# Altium PCB FMUM.PcbDoc (part 1 of 4)
Units mm, origin at the board's own origin, x right, y up, seen from the top; angles counter-clockwise.
Board outline 36 x 29 mm, 8 copper layers (Top Layer, GND1, Signal1, GND2, PWR1, Signal2, GND3, Bottom Layer), stack 1.01 mm thick; 117 components, 167 nets, 719 pads, 811 vias.
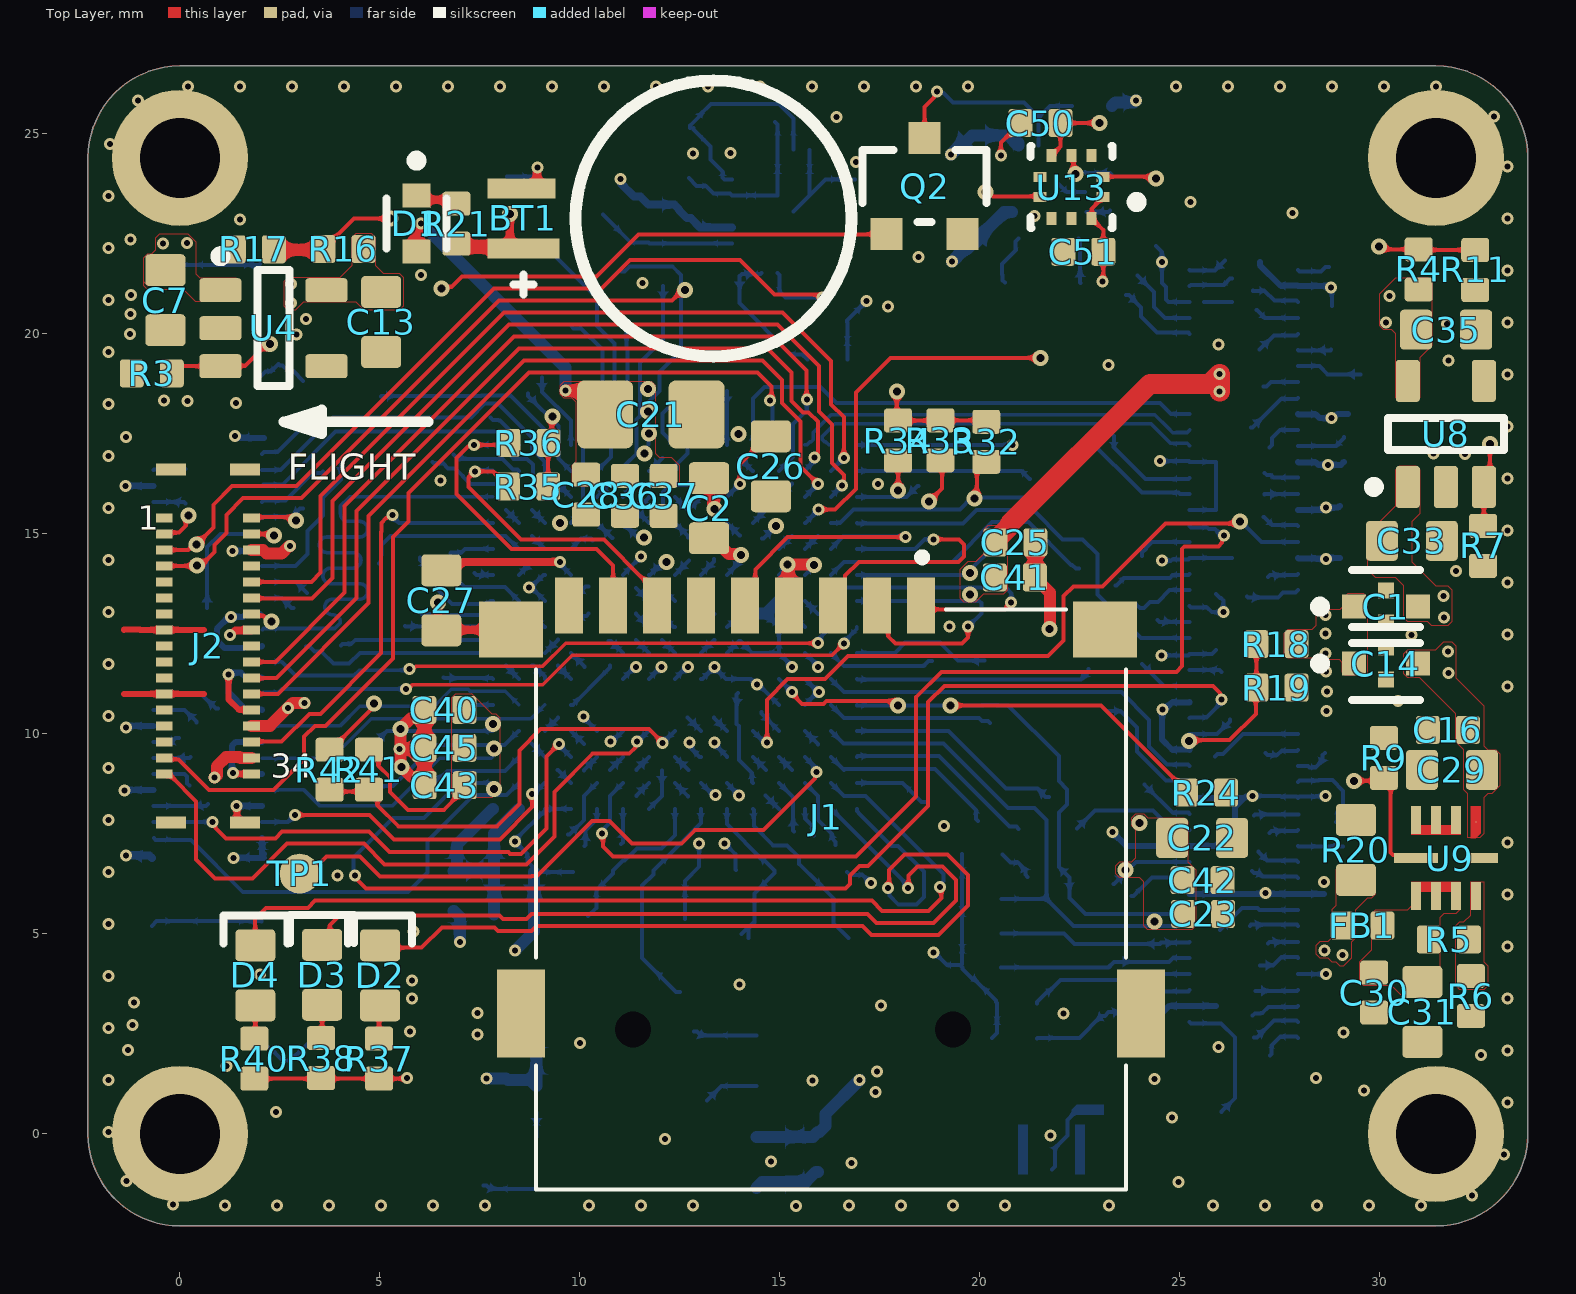
[diagram p0: Top Layer view]
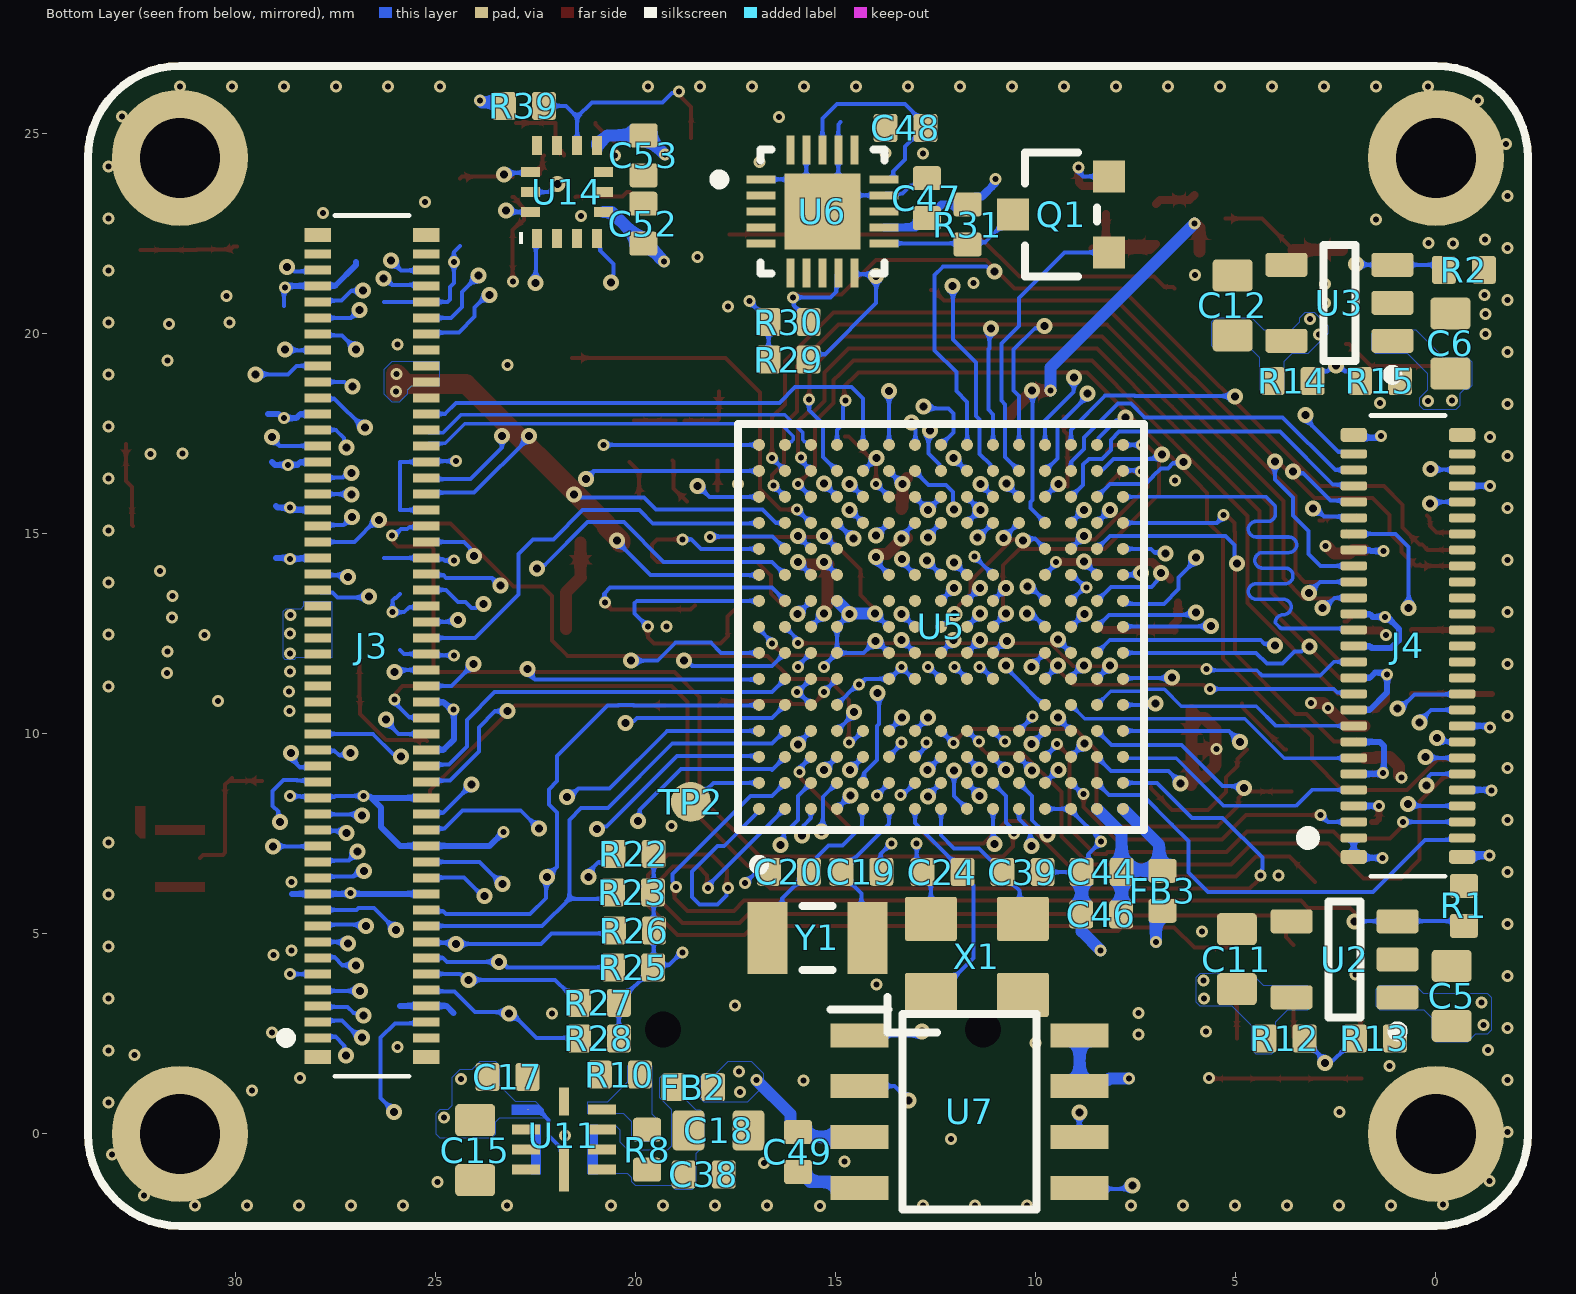
[diagram p1: Bottom Layer view, seen from below]
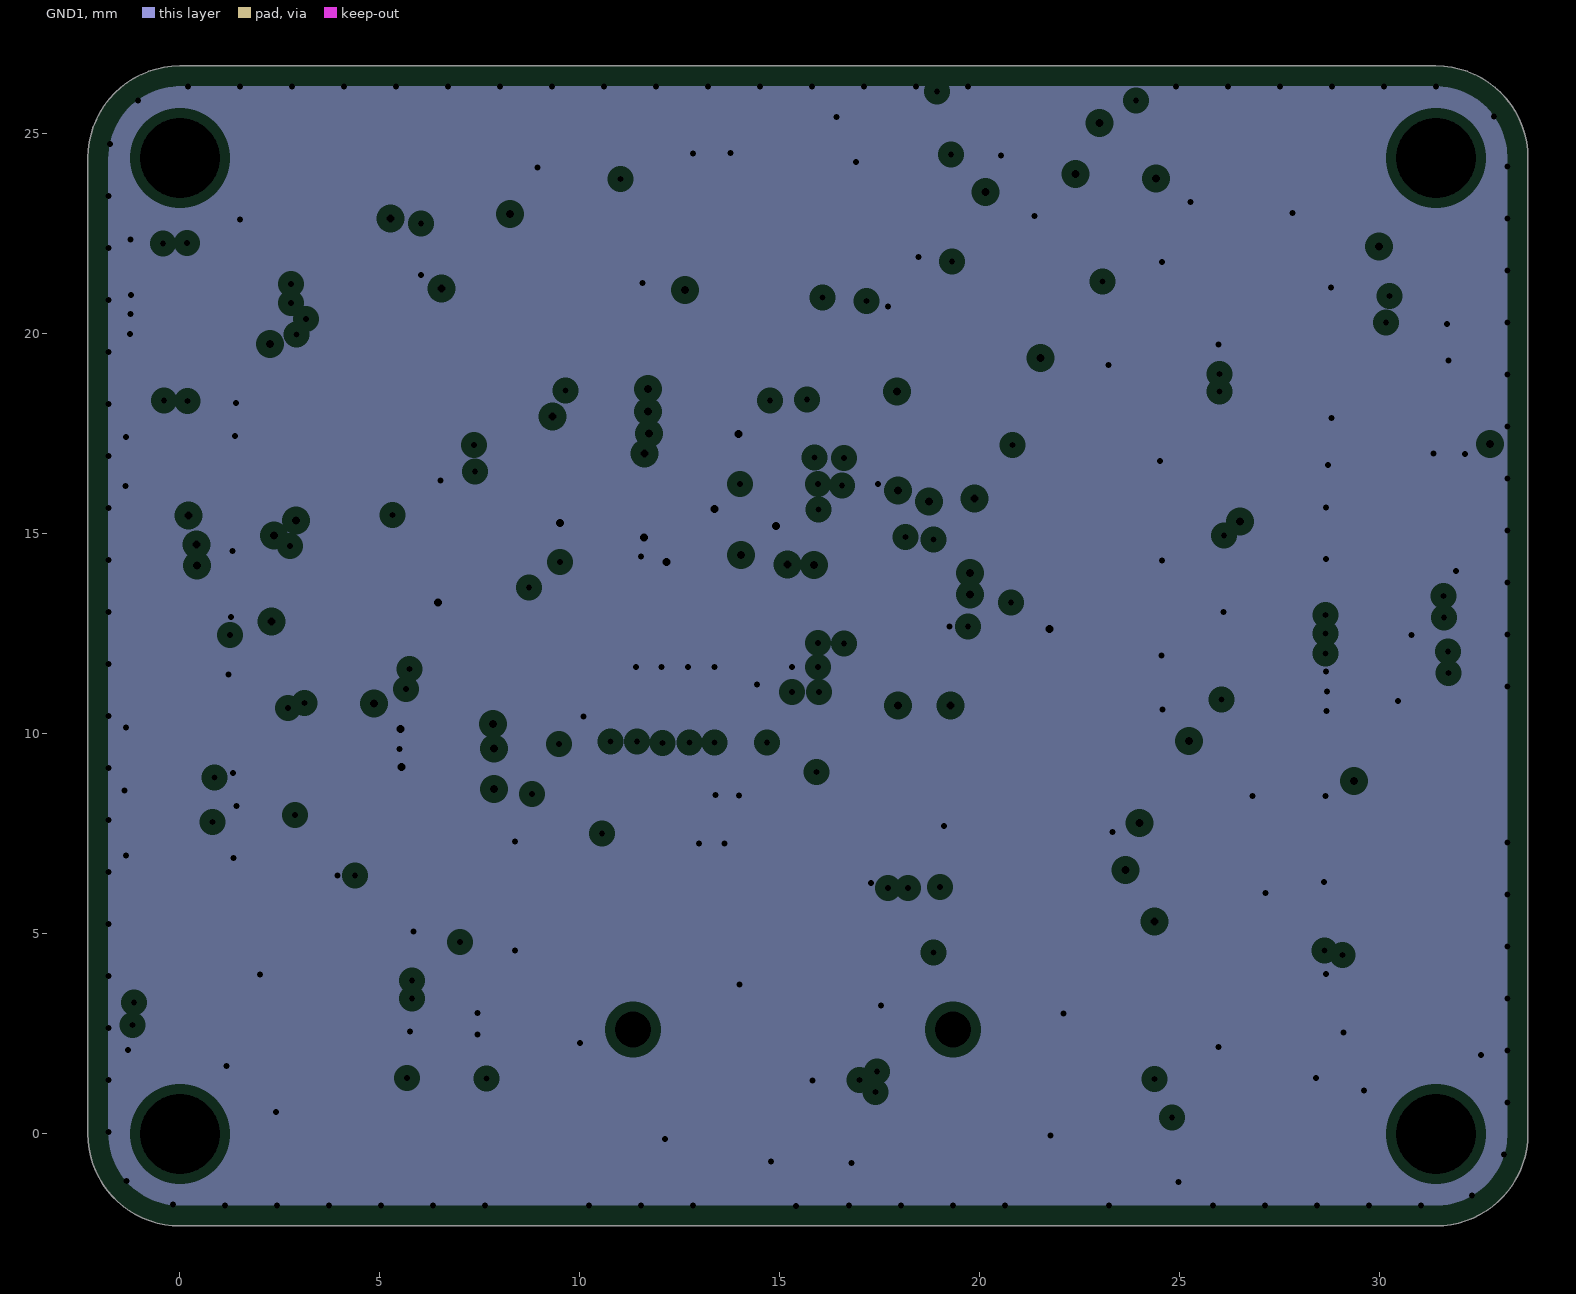
[diagram p2: GND1, clearances drawn from the general rule]
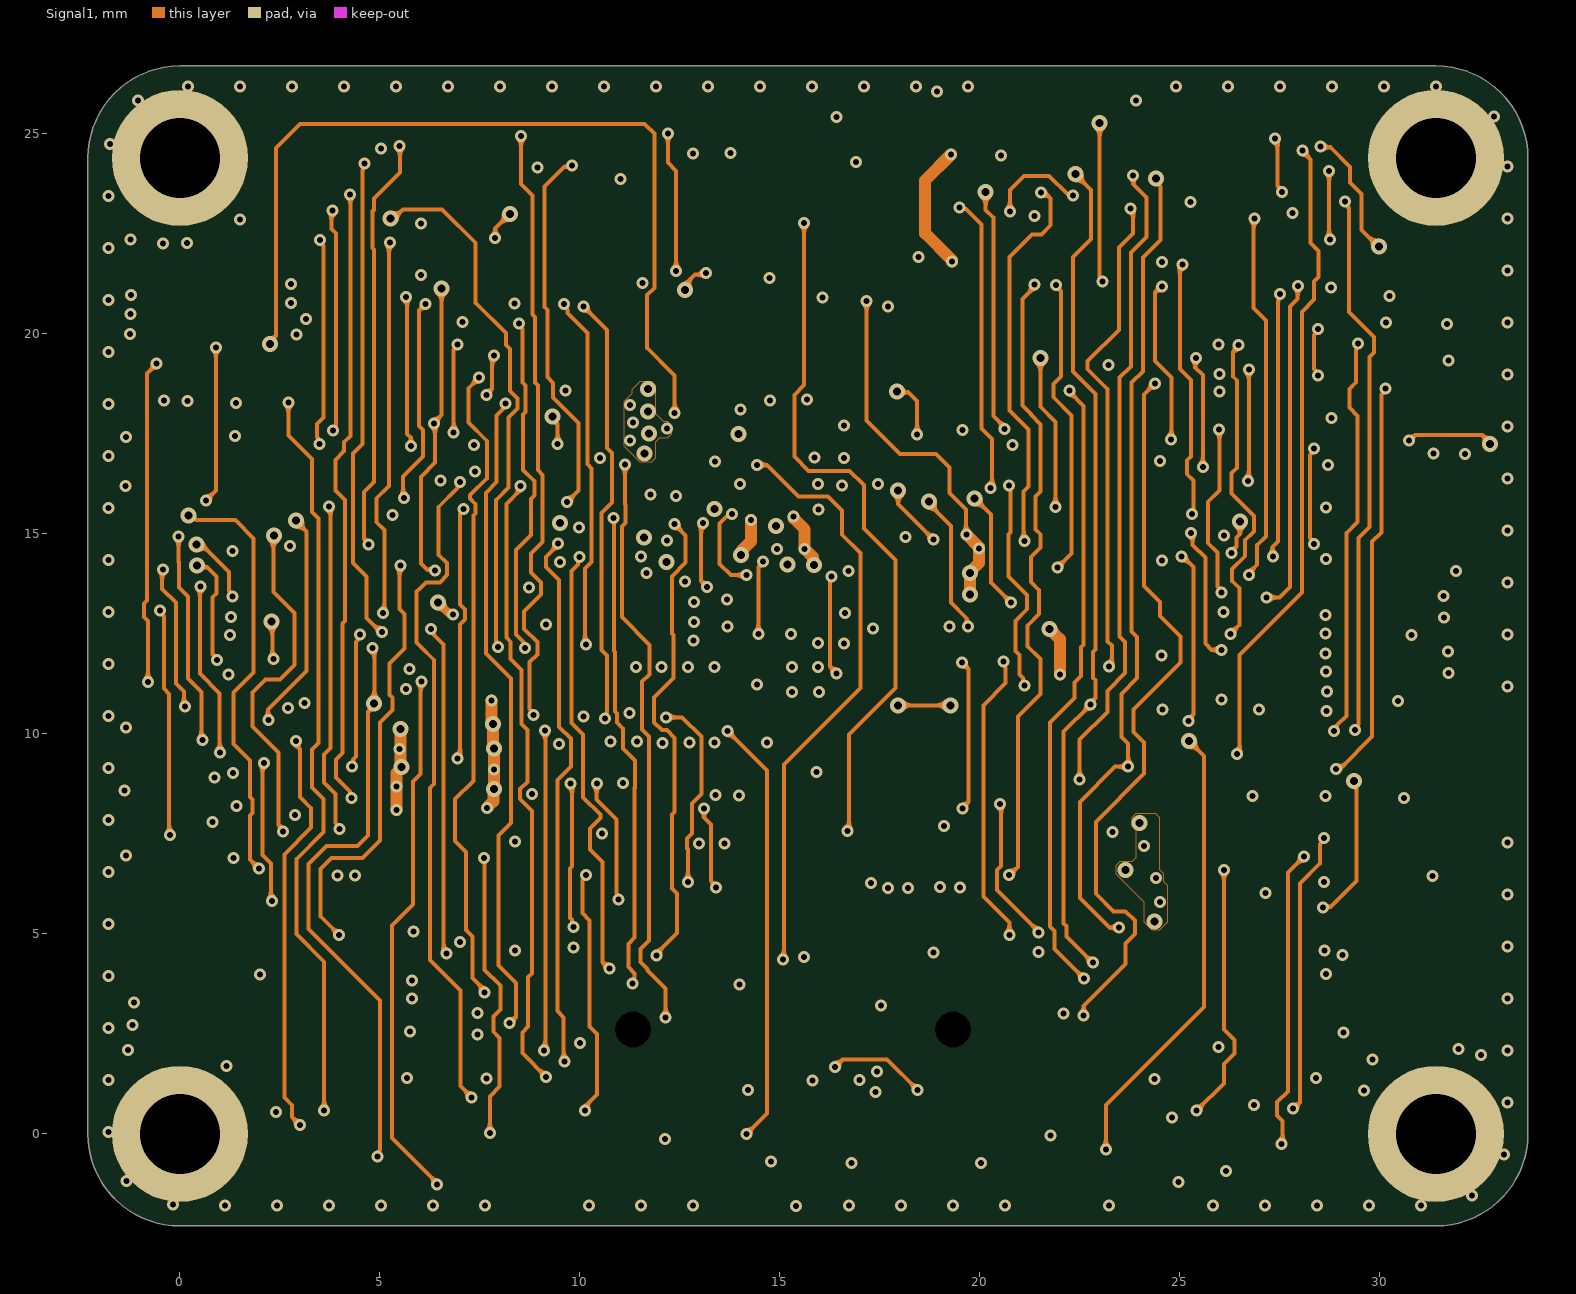
[diagram p3: Signal1]
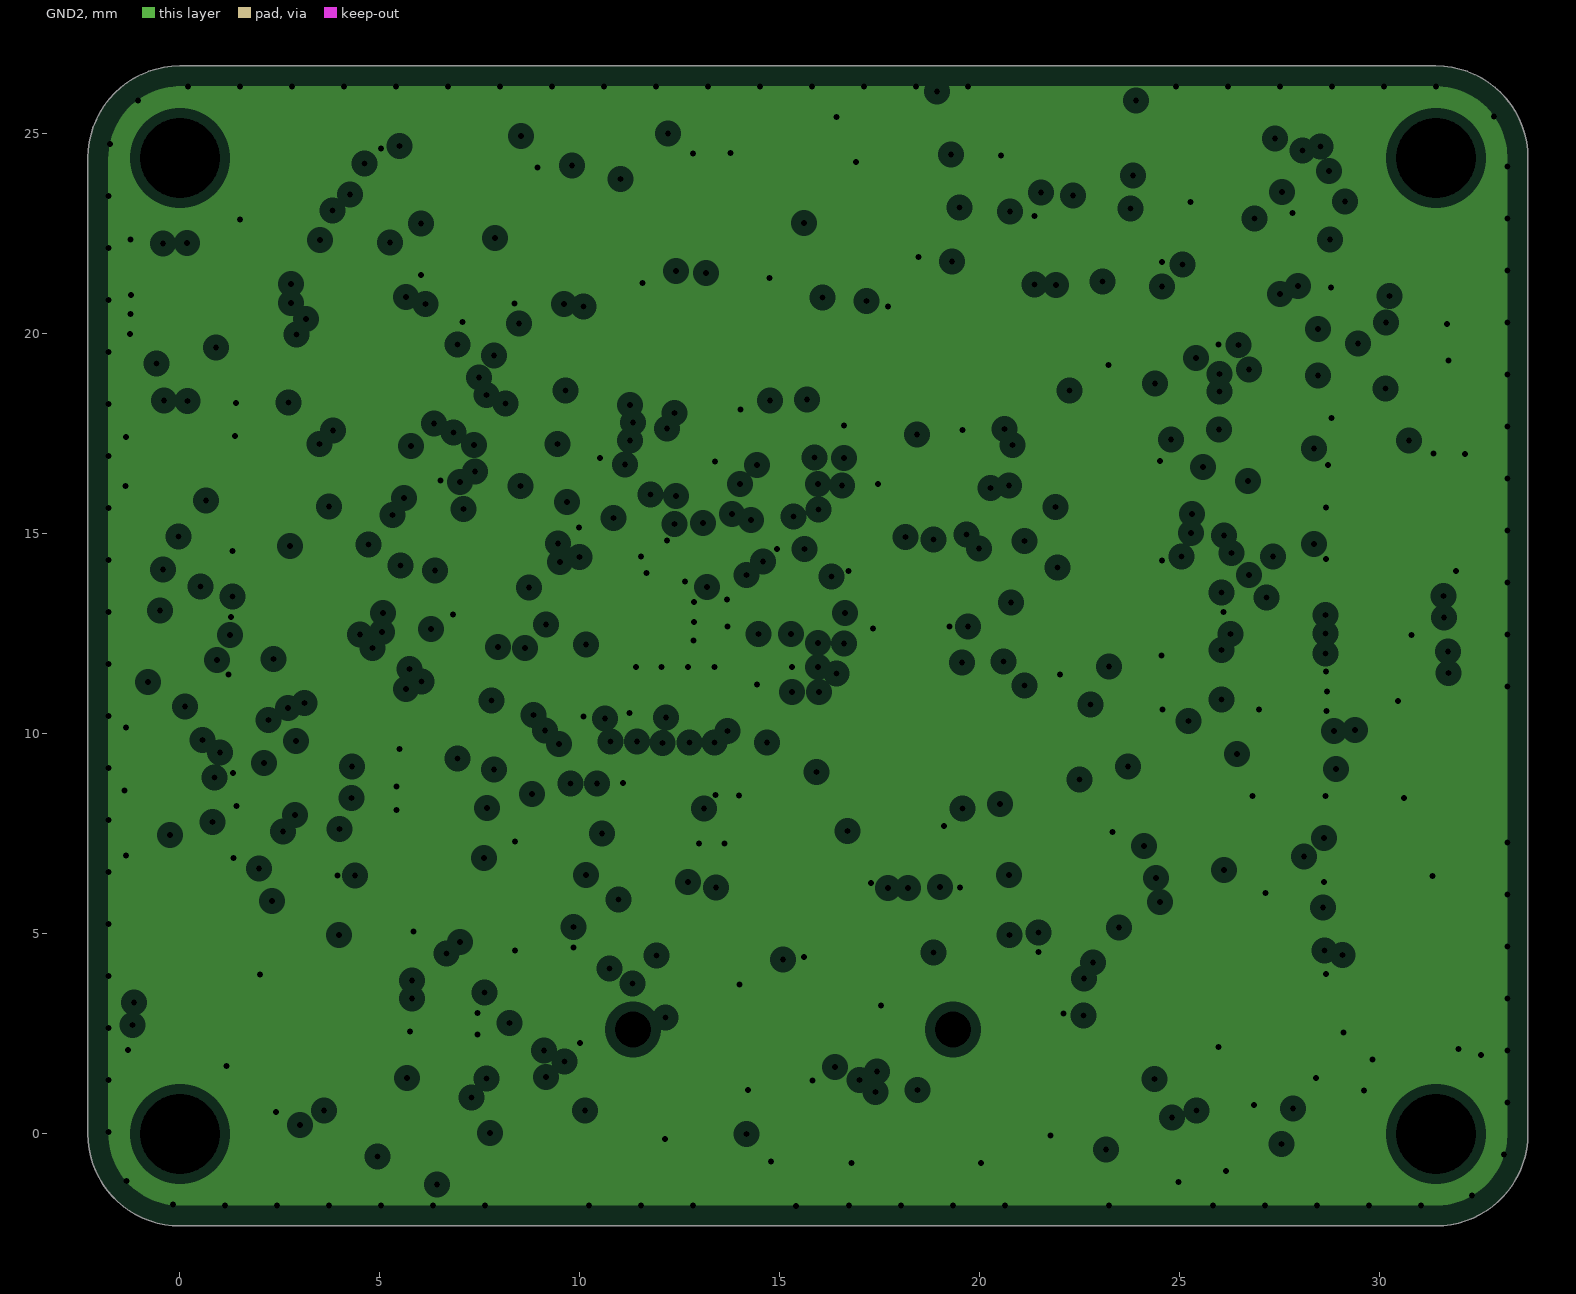
[diagram p4: GND2, clearances drawn from the general rule]
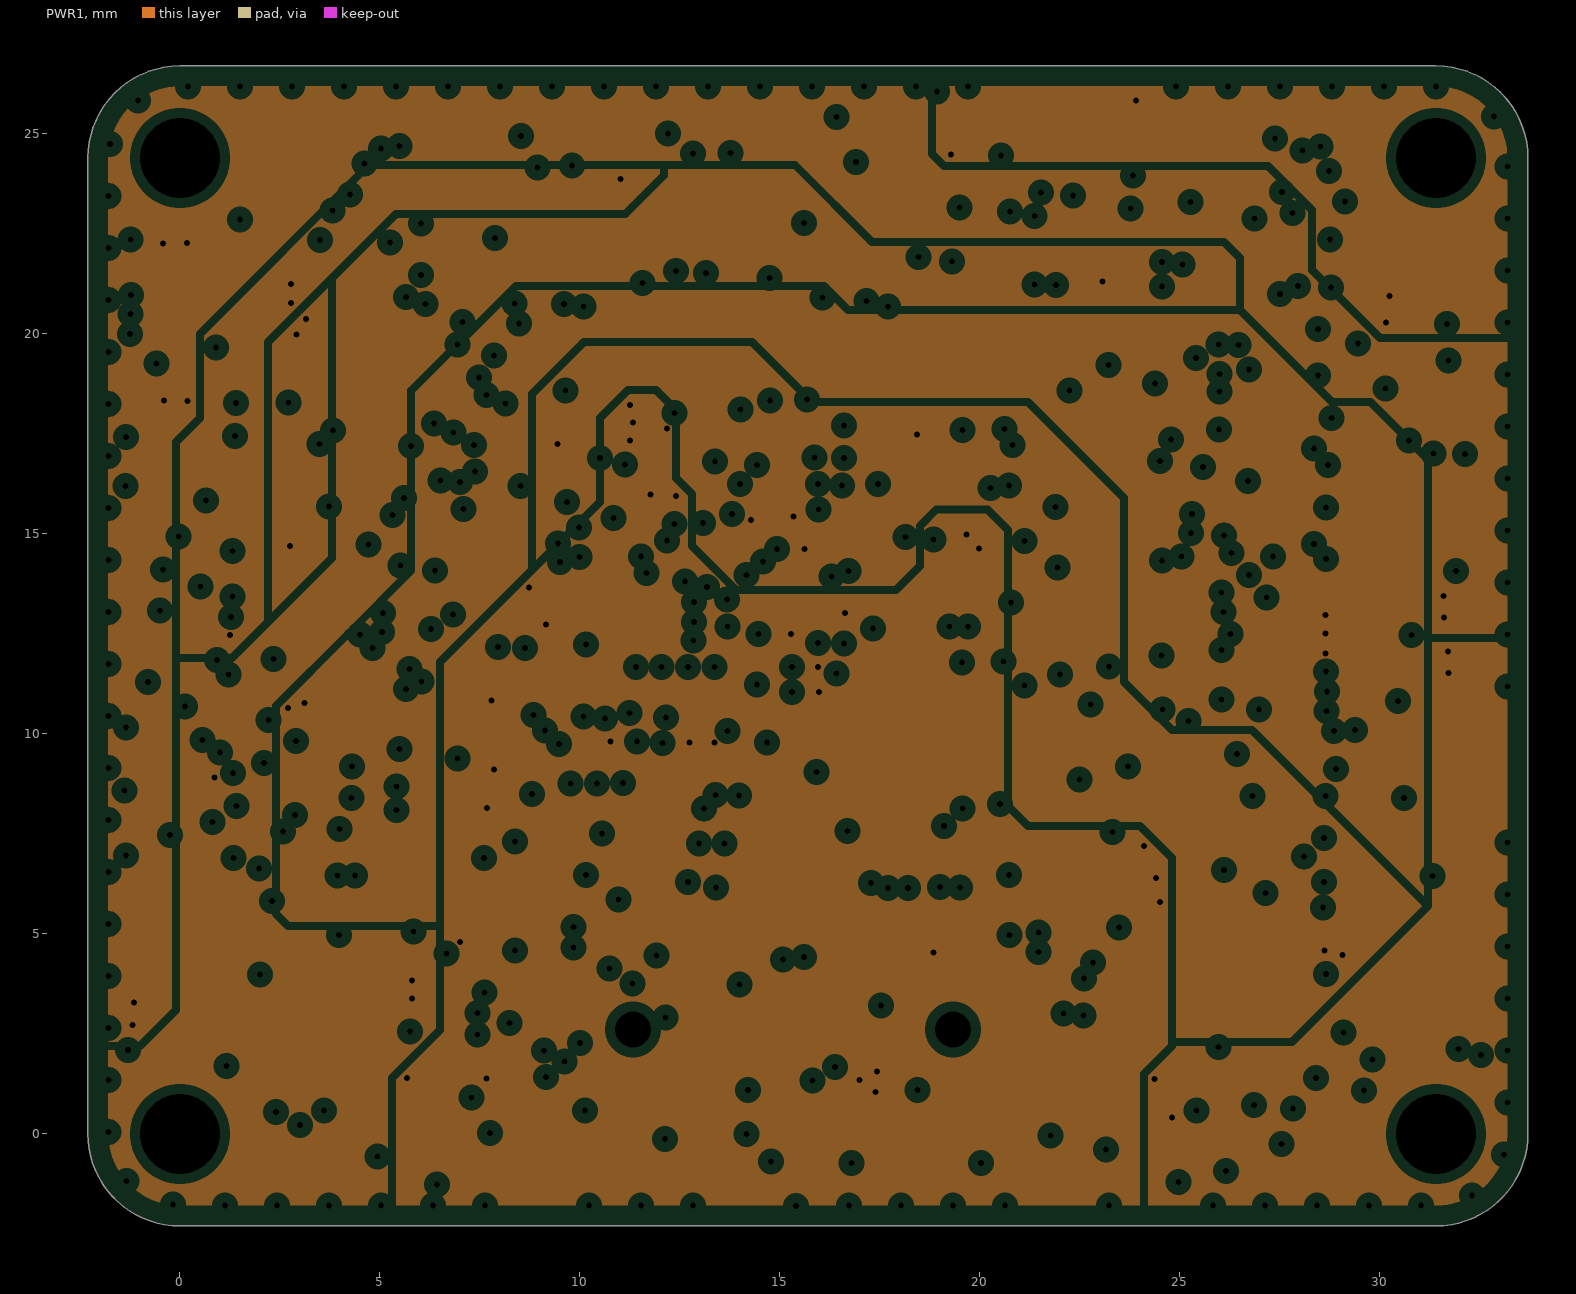
[diagram p5: PWR1, clearances drawn from the general rule]
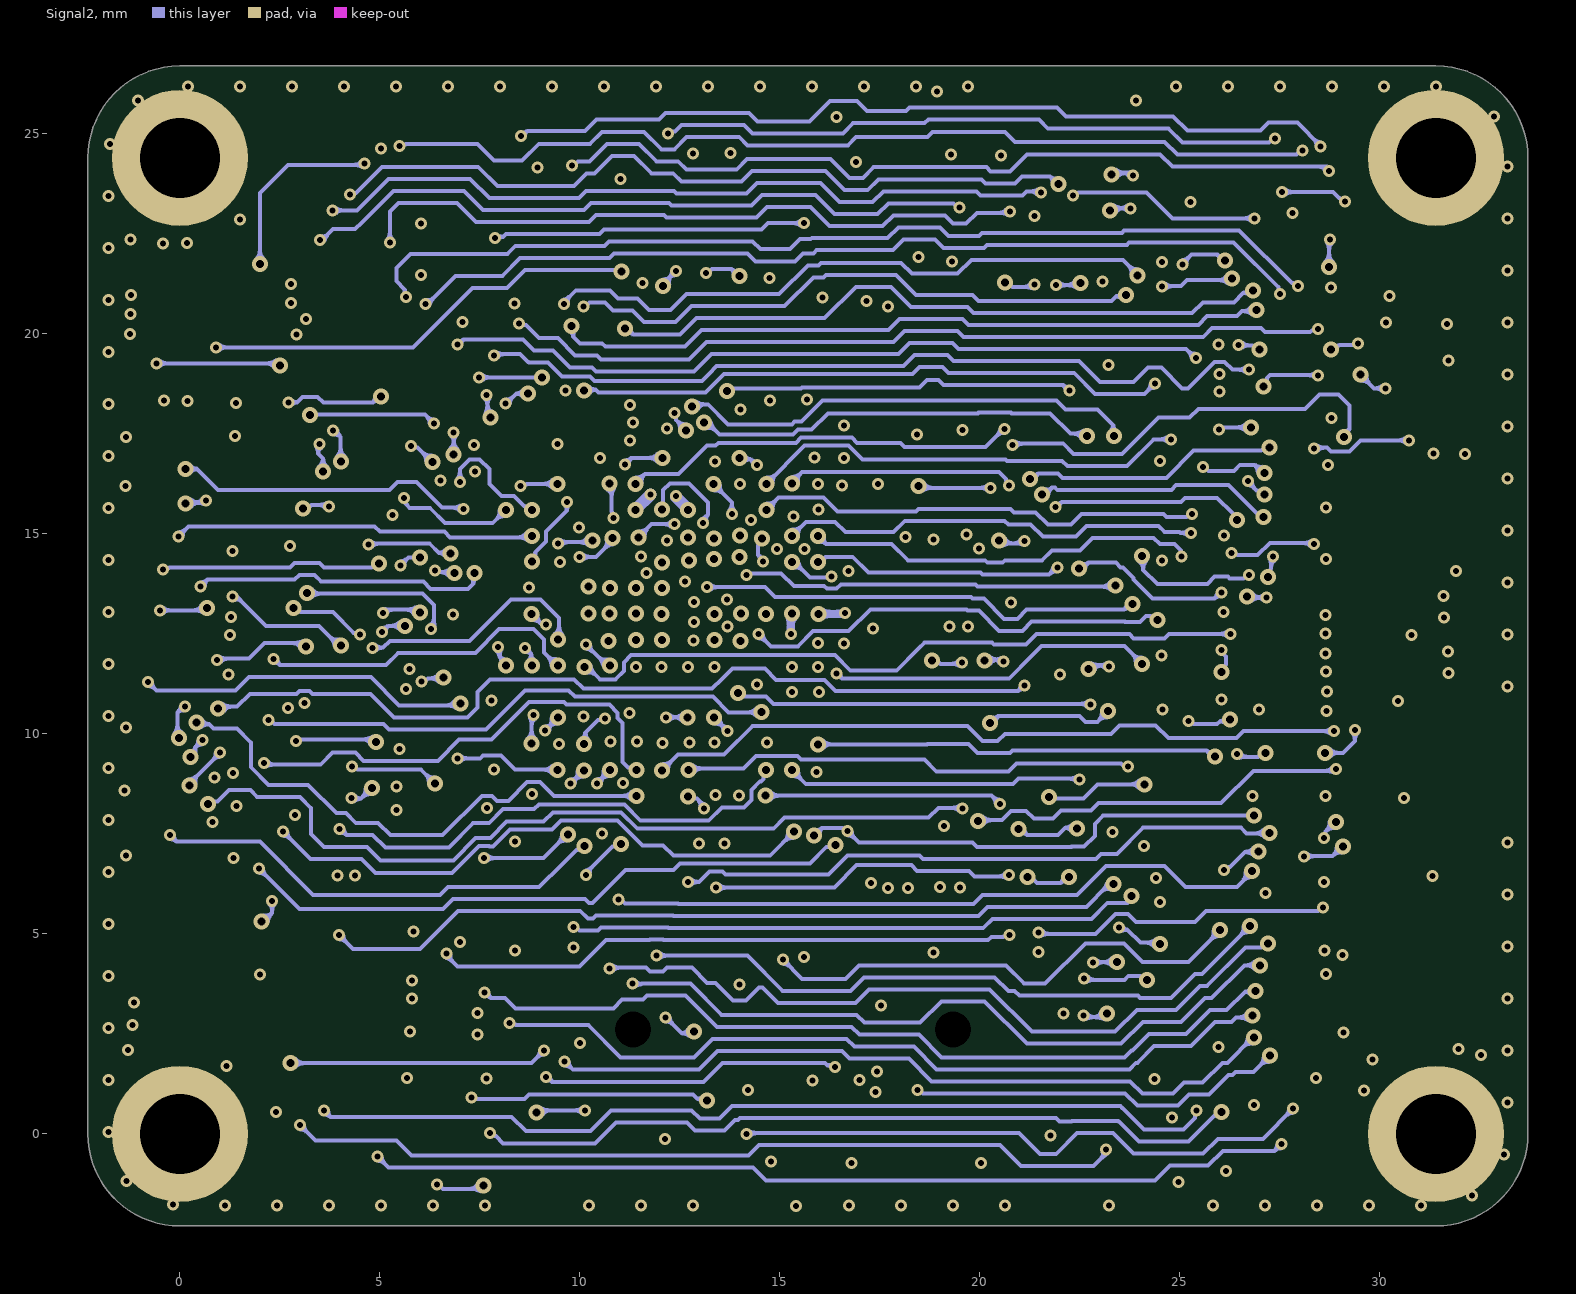
[diagram p6: Signal2]
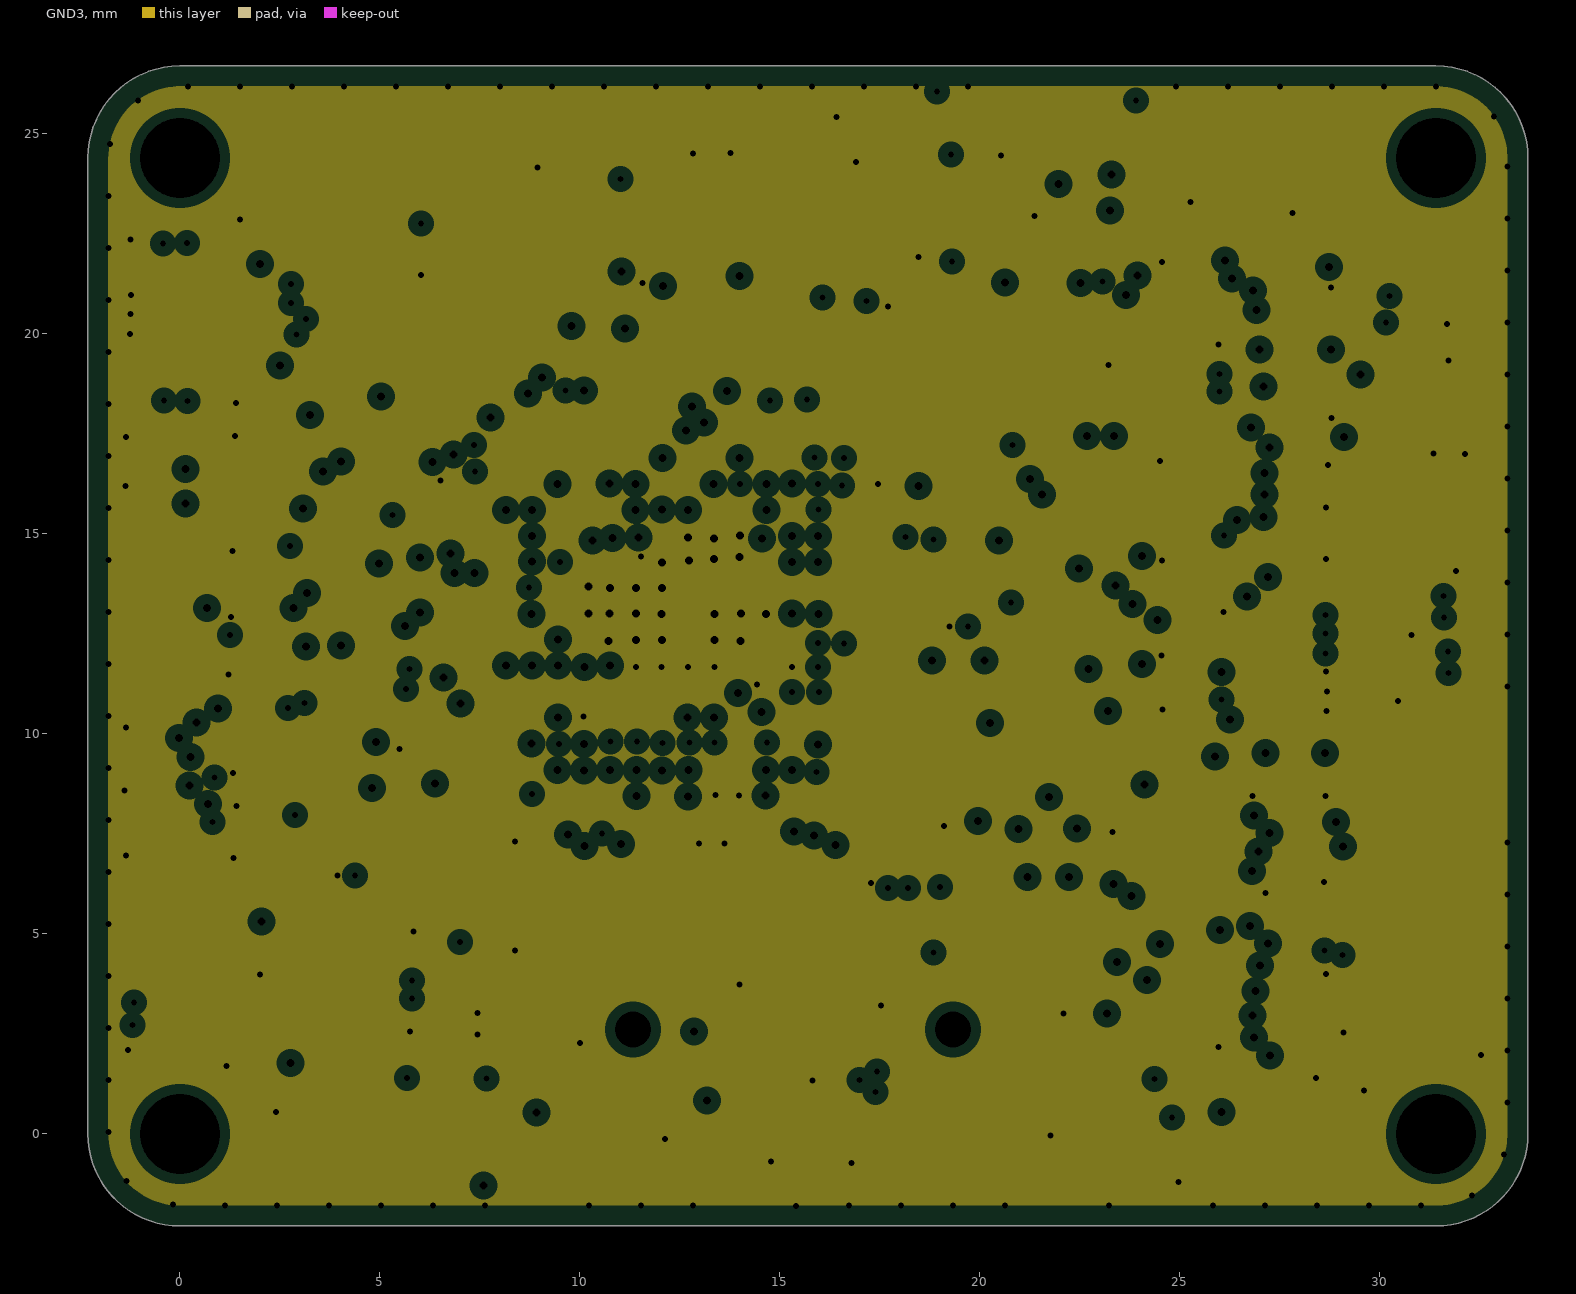
[diagram p7: GND3, clearances drawn from the general rule]
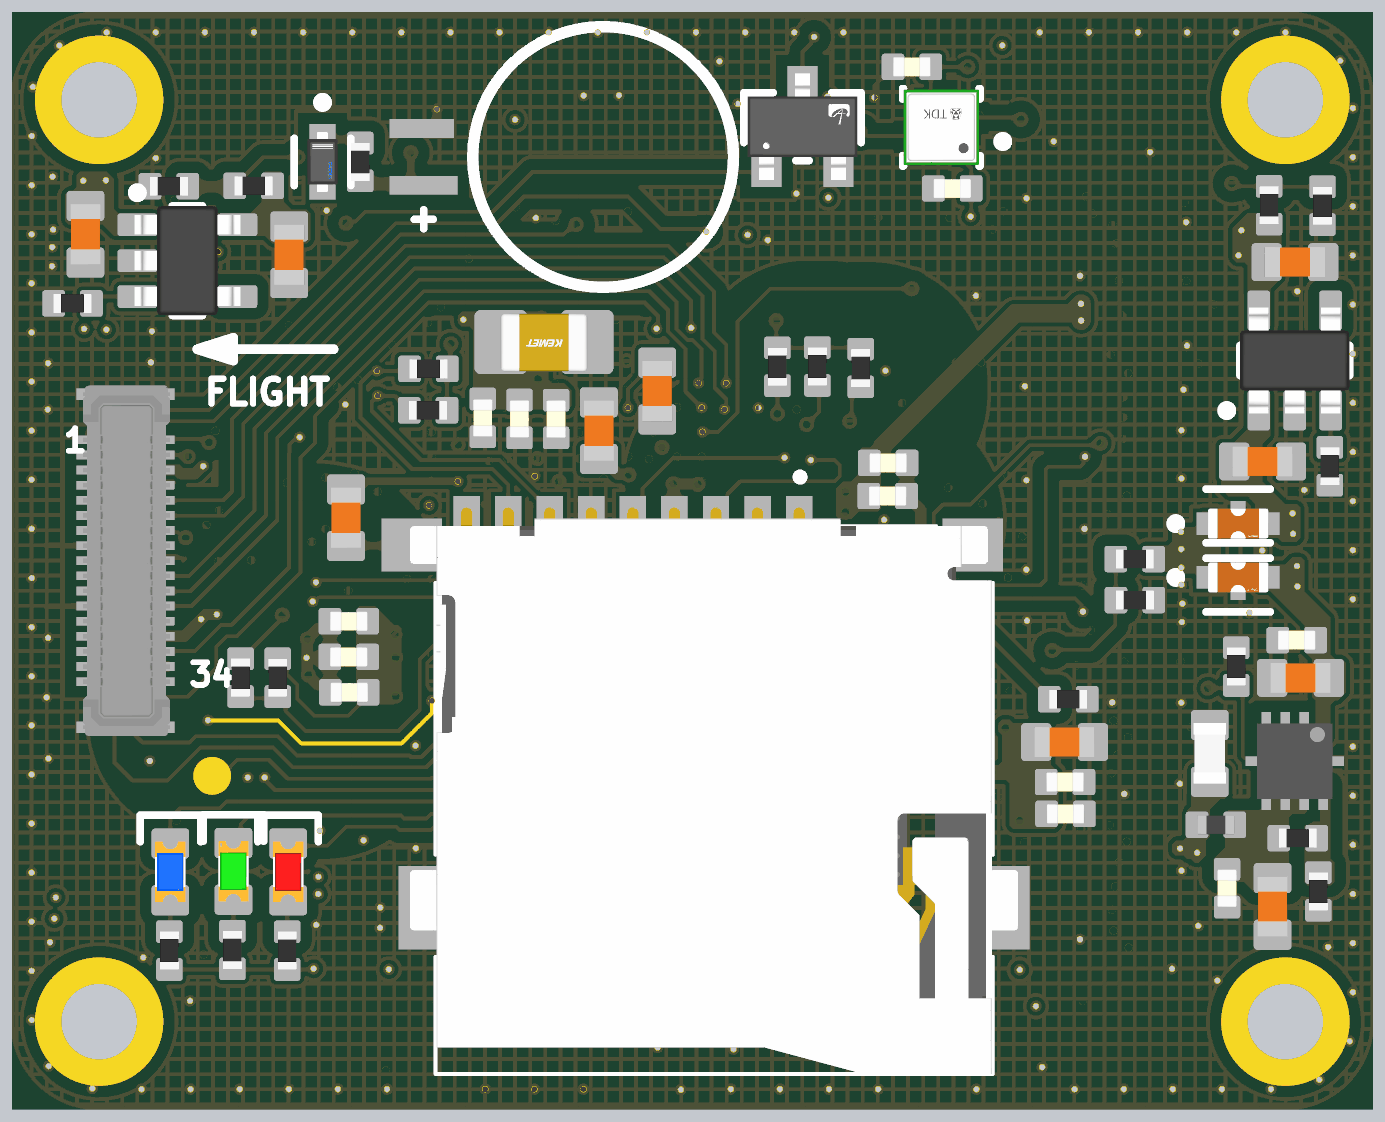
[diagram p11: 3D render of the assembled board from above, using the file's embedded part models]
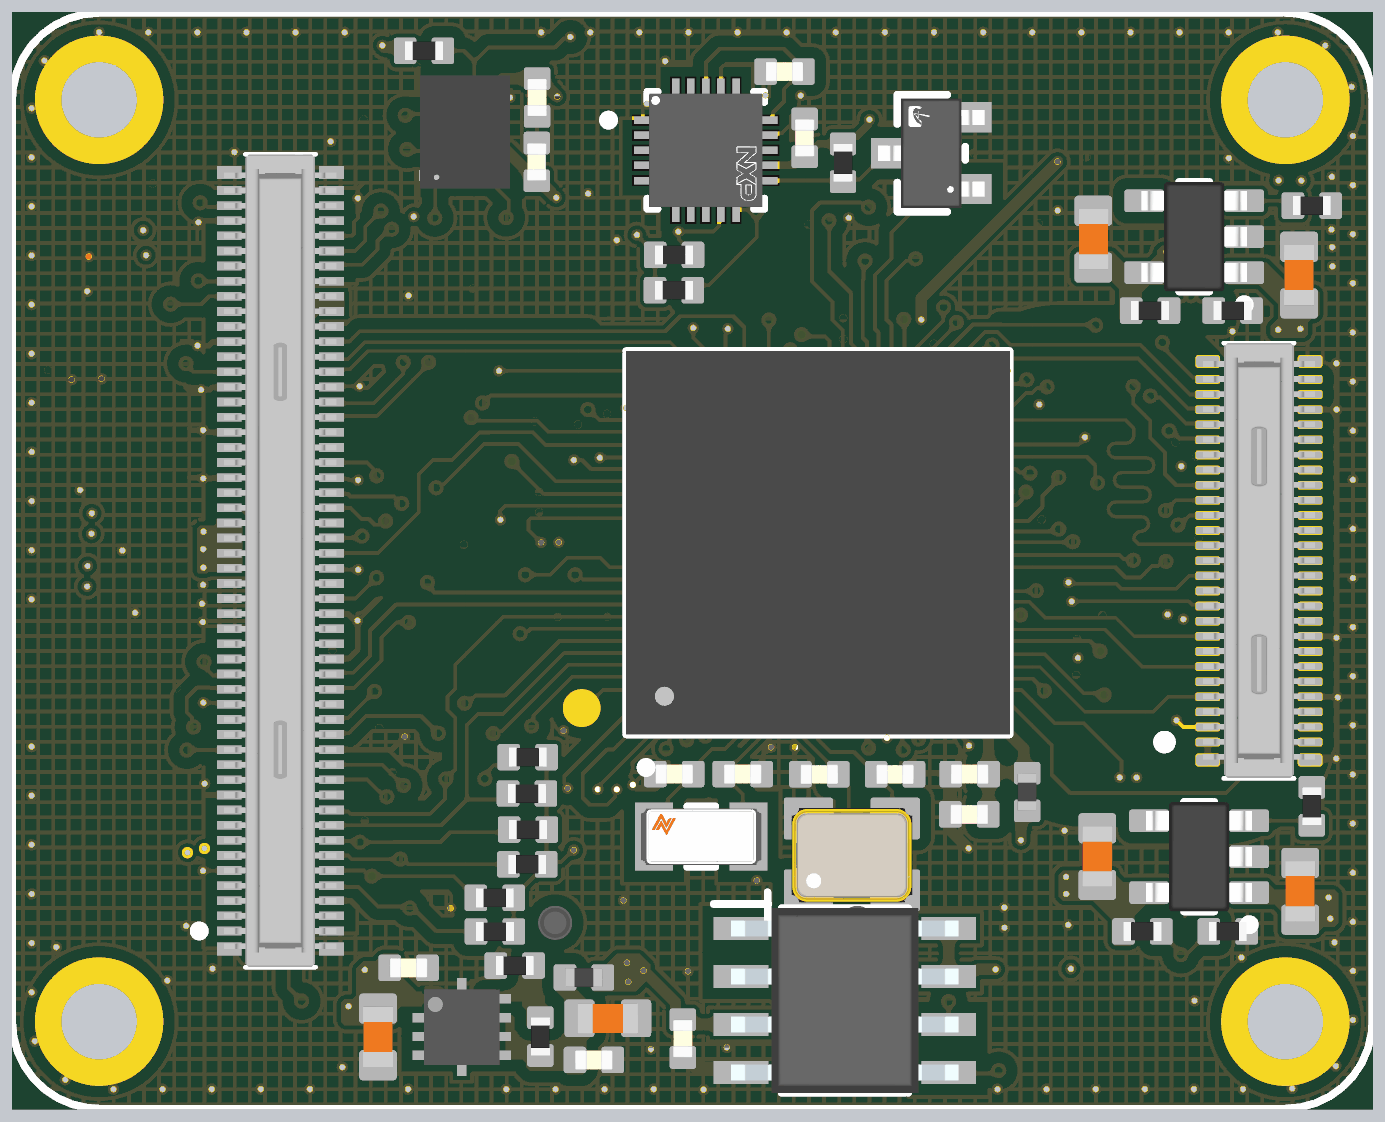
[diagram p12: 3D render of the assembled board from below, using the file's embedded part models]

## Layer stack, top to bottom
Top Solder: solder mask 0.0102, Solder Resist, Dk 3.8
Top Layer: signal copper 0.035
Dielectric 2: prepreg 0.06, PP-3313, Dk 3.8
GND1: plane copper 0.0175, net GND
Dielectric 4: prepreg 0.081, FR-4, Dk 4.6
Signal1: signal copper 0.0152
Dielectric 6: prepreg 0.254, PP-2116, Dk 4.16
GND2: plane copper 0.0152, net GND
Dielectric 1: dielectric 0.054, FR-4, Dk 4.6
PWR1: plane copper 0.0152, net (Multiple Nets)
Dielectric 7: prepreg 0.254, PP-2116, Dk 4.16
Signal2: signal copper 0.0152
Dielectric 5: prepreg 0.081, FR-4, Dk 4.6
GND3: plane copper 0.0175, net GND
Dielectric 3: prepreg 0.06, PP-3313, Dk 3.8
Bottom Layer: signal copper 0.035
Bottom Solder: solder mask 0.0102, Solder Resist, Dk 3.8

## Board outline
31.4,-2.3 ccw(c31.4,0) 33.7,0 33.7,24.4 ccw(c31.4,24.4) 31.4,26.7 0,26.7 ccw(c0,24.4) -2.3,24.4 -2.3,0 ccw(c0,0) 0,-2.3

## Design rules (kind name [scope] priority, off if disabled: settings)
Clearance Clearance_No_Via_In_Pad [IsVia vs IsPad] p1: gap=0.1 ignorepadtopadclearanceinfootprint=TRUE
Clearance Clearance_BGA [WithinRoom('BGA_Fanout')] p2: gap=0.1 ignorepadtopadclearanceinfootprint=TRUE
Clearance Clearance_Power [InNetClass('Power')] p3: gap=0.1 ignorepadtopadclearanceinfootprint=TRUE
Clearance Clearance_50ohm [InNetClass('ETH_RMII_RX') or InNetClass('ETH_RMII_TX') or InNetClass('SDMMC') vs InPolygon] p4: gap=3 ignorepadtopadclearanceinfootprint=TRUE
Clearance Clearance_Polygon [All vs InPolygon] p5: gap=0.3 ignorepadtopadclearanceinfootprint=TRUE
Clearance Clearance_Signal [All vs istrack and not InDifferentialPair('USB_D')] p6: gap=0.2 ignorepadtopadclearanceinfootprint=TRUE
DiffPairsRouting [InDifferentialPair('USB_D')] p1: maxlimit=0.13 minlimit=0.127 mostfreqgap=0.13 toplayer_mingap=0.13 toplayer_minwidth=0.1 toplayer_maxwidth=0.1 toplayer_prefwidth=0.1 midlayer3_maxgap=0.127 midlayer3_prefgap=0.127 midlayer3_minwidth=0.087 midlayer3_maxwidth=0.087 midlayer3_prefwidth=0.087 midlayer4_maxgap=0.127 midlayer4_prefgap=0.127 midlayer4_minwidth=0.087 midlayer4_maxwidth=0.087 midlayer4_prefwidth=0.087 bottomlayer_mingap=0.13 bottomlayer_minwidth=0.1 bottomlayer_maxwidth=0.1 bottomlayer_prefwidth=0.1 impedanceprofiledriven=TRUE impedanceprofileid={52F03CD9-A26F-4FEF-8F4B-1163E55FDE25} impedanceprofilevalue=90.000000 maxuncoupledlength=12.7
HoleToHoleClearance [All] p1: gap=0.28 allowstackedmicrovias=FALSE
MatchedLengths MatchedLengths_ETH_RX [InNetClass('ETH_RMII_RX')] p1: tolerance=1.27 checknetsindiffpair=FALSE checkdiffpairvsdiffpair=TRUE checkxsignals=TRUE checkothers=TRUE usedelayunits=TRUE delaytolerance=10.000000
MatchedLengths MatchedLengths_ETH_TX [InNetClass('ETH_RMII_TX')] p2: tolerance=1.27 checknetsindiffpair=FALSE checkdiffpairvsdiffpair=TRUE checkxsignals=TRUE checkothers=TRUE usedelayunits=TRUE delaytolerance=10.000000
MatchedLengths MatchedLengths_SDMMC [InNetClass('SDMMC')] p3: tolerance=1.27 checknetsindiffpair=FALSE checkdiffpairvsdiffpair=TRUE checkxsignals=TRUE checkothers=TRUE usedelayunits=TRUE delaytolerance=30.000000
MinimumSolderMaskSliver [All] p1: minsoldermaskwidth=0.2
PlaneClearance [All] p1: clearance=0.25
PlaneConnect [All] p1: planeconnectstyle=Direct reliefexpansion=0.508 reliefentries=4 reliefconductorwidth=0.254 reliefairgap=0.254
PolygonConnect [All] p1: connectstyle=Direct reliefconductorwidth=0.15 reliefentries=4 polygonreliefangle="45 Angle" airgapwidth=0.15
RoomDefinition BGA_Fanout [False vs False] p1: confinementstyle=ConfineIn formatcopy=TRUE lockcomponents=FALSE outline 6,19 18.465,19 18.465,6.736 6,6.736
RoutingVias RoutingVias_.15 [InDrillLayerPair('Signal1 - Signal2') or InDrillLayerPair('Top Layer - Bottom Layer')] p1: holewidth=0.15 width=0.3 viastyle="Through Hole" minholewidth=0.15 minwidth=0.3 maxholewidth=0.15 maxwidth=0.3
RoutingVias RoutingVias_Blind [InDrillLayerPair('Top Layer - Signal1')or InDrillLayerPair('Signal2 - Bottom Layer')] p2: holewidth=0.2 width=0.4 viastyle="Through Hole" minholewidth=0.2 minwidth=0.4 maxholewidth=0.2 maxwidth=0.4
SolderMaskExpansion [IsPad] p1: expansion=0.1 istentingtop=FALSE useseparateexpansions=TRUE expansionbottom=0.1 istentingbottom=FALSE
SolderMaskExpansion SolderMaskExpansion_Vias [IsVia] p2: expansion=0.1 istentingtop=TRUE useseparateexpansions=TRUE expansionbottom=0.1 istentingbottom=TRUE
SupplyNets "Schematic Supply Nets_7" [InNet('VDD_3V3_SENSORS3')] p1: voltage=0.000
SupplyNets "Schematic Supply Nets_6" [InNet('FMU_VDD_3V3')] p2: voltage=0.000
SupplyNets "Schematic Supply Nets_5" [InNet('VDD_3V3_SD_CARD')] p3: voltage=0.000
SupplyNets "Schematic Supply Nets_4" [InNet('VDD_3V3_SENSORS2')] p4: voltage=0.000
SupplyNets "Schematic Supply Nets_3" [InNet('VDD_3V3_SENSORS1')] p5: voltage=0.000
SupplyNets "Schematic Supply Nets_2" [InNet('GND')] p6: voltage=0.000
SupplyNets "Schematic Supply Nets_1" [InNet('VDD_5V_IN')] p7: voltage=0.000
SupplyNets "Schematic Supply Nets" [InNet('VDD_3V3_SENSORS4')] p8: voltage=0.000
Width Width_Impedance_Control [InNetClass('ETH_RMII_RX')or InNetClass('ETH_RMII_TX')or InNetClass('SDMMC')] p1: maxlimit=0.089 minlimit=0.089 preferedwidth=0.089
Width Width_Main [All] p2: maxlimit=0.5 minlimit=0.1 preferedwidth=0.1
25 further rules are at their usual default settings.

## Classes and differential pairs
net class UART4: UART4_RX UART4_TX
net class SPI5: SPI5_MISO_FRAM SPI5_MOSI_FRAM SPI5_nCS1_FRAM SPI5_SCK_FRAM
net class I2C4: I2C4_SCL_FMU I2C4_SDA_FMU
net class Power: FMU_VDD_3V3 FMU_VDD_5V SENSORS_VDD_5V VDD_3V3_SD_CARD VDD_3V3_SD_CARD_EN VDD_3V3_SENSORS1 VDD_3V3_SENSORS1_EN VDD_3V3_SENSORS2 VDD_3V3_SENSORS2_EN VDD_3V3_SENSORS3 VDD_3V3_SENSORS3_EN VDD_3V3_SENSORS4 VDD_3V3_SENSORS4_EN VDD_5V_IN
net class SPI1: SPI1_DRDY1_BMI330 SPI1_MISO_SENSOR1_BMI330 SPI1_MOSI_SENSOR1_BMI330 SPI1_nCS1_BMI330 SPI1_SCK_SENSOR1_BMI330
net class ETH_RMII_RX: ETH_CRS_DV ETH_RXD0 ETH_RXD1
net class ETH_RMII_SLOW: ETH_MDC ETH_MDIO ETH_POWER_EN
net class SDMMC: SDMMC2_CLK SDMMC2_CMD SDMMC2_D0 SDMMC2_D1 SDMMC2_D2 SDMMC2_D3
net class USB: USB_D_N USB_D_P
net class USART6: USART6_RX_FROM_IO__RC_INPUT USART6_TX_TO_IO__NC
net class USART3: USART3_RX_DEBUG USART3_TX_DEBUG
net class USART2: USART2_CTS_TELEM3 USART2_RTS_TELEM3 USART2_RX_TELEM3 USART2_TX_TELEM3
net class USART1: USART1_RX_GPS1 USART1_TX_GPS1
net class UART8: UART8_RX_GPS2 UART8_TX_GPS2
net class UART7: UART7_CTS_TELEM1 UART7_RTS_TELEM1 UART7_RX_TELEM1 UART7_TX_TELEM1
net class UART5: UART5_CTS_TELEM2 UART5_RTS_TELEM2 UART5_RX_TELEM2 UART5_TX_TELEM2
net class SPI6: SPI6_DRDY1_EXTERNAL1 SPI6_DRDY2_EXTERNAL1 SPI6_MISO_EXTERNAL1 SPI6_MOSI_EXTERNAL1 SPI6_nCS1_EXTERNAL1 SPI6_nCS2_EXTERNAL1 SPI6_nRESET_EXTERNAL1 SPI6_SCK_EXTERNAL1 SPIX_SYNC
net class SPI4: SPI4_DRDY1 SPI4_MISO_SENSOR4 SPI4_MOSI_SENSOR4 SPI4_nCS1 SPI4_SCK_SENSOR4
net class SPI3: SPI3_DRDY2_BMI088_INT3_GYRO SPI3_MISO_SENSOR3_BMI088 SPI3_MOSI_SENSOR3_BMI088 SPI3_nCS1_BMI088_ACCEL SPI3_nCS2_BMI088_GYRO SPI3_SCK_SENSOR3_BMI088
net class SPI2: SPI2_DRDY2_ISM330_INT2 SPI2_MISO_SENSOR2_ISM330 SPI2_MOSI_SENSOR2_ISM330 SPI2_nCS1_ISM330 SPI2_SCK_SENSOR2_ISM330
net class PWM: FMU_CH1 FMU_CH2 FMU_CH3 FMU_CH4 FMU_CH5 FMU_CH6 FMU_CH7 FMU_CH8
net class I2C3: I2C3_SCL_EXTERNAL1 I2C3_SDA_EXTERNAL1
net class I2C2: I2C2_SCL_BASE_GPS2_MAG_LED_PM2 I2C2_SDA_BASE_GPS2_MAG_LED_PM2
net class I2C1: I2C1_SCL_BASE_GPS1_MAG_LED_PM1 I2C1_SDA_BASE_GPS1_MAG_LED_PM1
net class ETH_RMII_TX: ETH_REF_CLK ETH_TX_EN ETH_TXD0 ETH_TXD1
net class CAN2: CAN2_RX CAN2_TX
net class CAN1: CAN1_RX CAN1_TX
component class Sensors: C50 C51 C52 C53 J2 Q2 R39 U13 U14
component class PAB: J3 J4
component class Memory: C2 C47 C48 C49 J1 Q1 R31 R32 R33 R34 R35 R36 U6 U7
component class "FMU MCU": BT1 C19 C20 C21 C22 C23 C24 C25 C26 C27 C28 C36 C37 C39 C40 C41 C42 C43 C44 C45 C46 D1 D2 D3 D4 FB3 R21 R22 R23 R24 R25 R26 R27 R28 R29 R30 R37 R38 R40 R41 R42 TP1 TP2 U5 X1 Y1
component class Power: C1 C5 C6 C7 C11 C12 C13 C14 C15 C16 C17 C18 C29 C30 C31 C33 C35 C38 FB1 FB2 R1 R2 R3 R4 R5 R6 R7 R8 R9 R10 R11 R12 R13 R14 R15 R16 R17 R18 R19 R20 U2 U3 U4 U8 U9 U11
differential pair USB_D: +USB_D_P -USB_D_N

## Components (designator, comment, footprint, x,y, rotation, side; value= is the part's Value field where it differs from the comment)
BT1 "MS621FE-FL11E" SEIK-MS621FE-FL11E-2_V 13.341,22.888 r180 top
C1 "NFM18PC104R1C3D" FP-NFM18-0_1-e0_15_0_35-MFG 30.15,13.183 r0 top
C2 "10uF" CAP_0603 13.229,15.642 r270 top
C5 "10uF" CAP_0603 -0.393,3.45 r270 bottom
C6 "10uF" CAP_0603 -0.363,19.762 r270 bottom
C7 "10uF" CAP_0603 -0.363,20.843 r90 top
C11 "10uF" CAP_0603 4.978,4.369 r270 bottom
C12 "10uF" CAP_0603 5.083,20.713 r270 bottom
C13 "10uF" CAP_0603 5.031,20.299 r90 top
C14 "NFM18PC104R1C3D" FP-NFM18-0_1-e0_15_0_35-MFG 30.15,11.76 r0 top
C15 "22uF" CAP_0603 24.018,-0.405 r90 bottom
C16 "0.1uF" CAP_0402 31.7,10.1 r0 top
C17 "0.1uF" CAP_0402 23.208,1.424 r0 bottom
C18 "22uF" CAP_0603 17.935,0.087 r0 bottom
C19 "18pF/C0G" CAP_0402 14.364,6.554 r0 bottom
C20 "18pF/C0G" CAP_0402 16.176,6.554 r180 bottom
C21 "47uF" CAP_0805 11.776,17.989 r180 top
C22 "4.7uF" CAP_0603 25.556,7.4 r180 top
C23 "100nF" CAP_0402 25.579,5.501 r180 top
C24 "22pF/C0G" CAP_0402 12.336,6.547 r180 bottom
C25 "1uF" CAP_0402 20.886,14.789 r180 top
C26 "2.2uF/10V" CAP_0603 14.773,16.692 r270 top
C27 "2.2uF/10V" CAP_0603 6.534,13.339 r90 top
C28 "100nF" CAP_0402 10.156,15.981 r90 top
C29 "22uF" CAP_0603 31.8,9.1 r0 top
C30 "0.1uF" CAP_0402 29.856,3.533 r90 top
C31 "22uF" CAP_0603 31.062,3.05 r90 top
C33 "10uF" CAP_0603 30.798,14.827 r180 top
C35 "10uF" CAP_0603 31.654,20.106 r180 top
C36 "1uF" CAP_0402 11.127,15.954 r90 top
C37 "100nF" CAP_0402 12.095,15.952 r90 top
C38 "0.1uF" CAP_0402 18.305,-1.014 r0 bottom
C39 "22pF/C0G" CAP_0402 10.332,6.547 r0 bottom
C40 "1uF" CAP_0402 6.61,10.599 r0 top
C41 "100nF" CAP_0402 20.872,13.914 r180 top
C42 "1uF" CAP_0402 25.568,6.344 r180 top
C43 "100nF" CAP_0402 6.62,8.718 r0 top
C44 "100nF" CAP_0402 8.357,6.553 r180 bottom
C45 "1uF" CAP_0402 6.608,9.653 r0 top
C46 "1uF" CAP_0402 8.367,5.488 r180 bottom
C47 "0.1uF" CAP_0402 12.725,23.393 r270 bottom
C48 "0.1uF" CAP_0402 13.258,25.149 r180 bottom
C49 "100n" CAP_0402 15.949,-0.449 r90 bottom
C50 "100nF" CAP_0402 21.514,25.273 r0 top
C51 "100nF" CAP_0402 22.584,22.054 r0 top
C52 "100nF" CAP_0402 19.816,22.756 r270 bottom
C53 "100nF" CAP_0402 19.807,24.462 r90 bottom
D1 "SOD-523" FP-SOD523-MFG 5.913,22.757 r270 top
D2 "RED" LED_0603_RED 5.004,3.964 r270 top
D3 "GREEN" LED_0603_GREEN 3.555,3.979 r270 top
D4 "BLUE" LED_0603_BLUE 1.885,3.964 r270 top
FB1 "120R@100M" FB_0402 29.562,5.21 r180 top
FB2 "120R@100M" FB_0402 18.567,1.168 r180 bottom
FB3 "60R@100M/300mA" FB_0402 6.835,6.079 r90 bottom
J1 "TF-15x15" TF15X15 16.054,6.266 r0 top locked
J2 "BM20B(0.8)-34DS-0.4V" BM20B(0.8)-34DS-0.4V 0.7,12.2 r270 top locked
J3 "CONN HDR 100POS 0.4MM SMD GOLD" HIROSE_DF40C-100DP-0_4V51 26.6,12.2 r90 bottom
J4 "CONN HDR 50POS 0.4MM SMD GOLD" HIROSE_DF40C-50DP-0-4V51 0.7,12.2 r90 bottom
Q1 "AO3400A" FP-SOT23-MFG 9.373,22.987 r0 bottom
Q2 "AO3400A" FP-SOT23-MFG 18.618,23.692 r90 top
R1 "10K" RES_0402 -0.7,5.7 r90 bottom
R2 "10K" RES_0402 -0.7,21.6 r180 bottom
R3 "10K" RES_0402 -0.704,19.013 r180 top
R4 "10K" RES_0402 30.969,21.611 r270 top
R5 "82K" RES_0402 31.727,4.858 r180 top
R6 "18K" RES_0402 32.274,3.445 r90 top
R7 "10K" RES_0402 32.579,14.702 r270 top
R8 "82K" RES_0402 19.721,-0.395 r270 bottom
R9 "10K" RES_0402 30.1,9.4 r90 top
R10 "18K" RES_0402 20.401,1.484 r180 bottom
R11 "10K" RES_0402 32.383,21.598 r90 top
R12 "10K" RES_0402 3.785,2.388 r0 bottom
R13 "10K" RES_0402 1.524,2.388 r0 bottom
R14 "10K" RES_0402 3.581,18.821 r0 bottom
R15 "10K" RES_0402 1.396,18.823 r0 bottom
R16 "10K" RES_0402 4.089,22.123 r0 top
R17 "10K" RES_0402 1.846,22.114 r0 top
R18 "10K" RES_0402 27.413,12.245 r0 top
R19 "10K" RES_0402 27.417,11.16 r180 top
R20 "220R" RES_0603 29.4,7.1 r270 top
R21 "1K5" RES_0402 6.913,22.756 r270 top
R22 "1.5K" RES_0402 20.056,7.002 r180 bottom
R23 "1.5K" RES_0402 20.075,6.039 r180 bottom
R24 "10K" RES_0402 25.654,8.534 r180 top
R25 "1.5K" RES_0402 20.068,4.163 r180 bottom
R26 "1.5K" RES_0402 20.047,5.085 r180 bottom
R27 "1.5K" RES_0402 20.927,3.276 r180 bottom
R28 "1.5K" RES_0402 20.924,2.386 r180 bottom
R29 "1.5K" RES_0402 16.184,19.36 r0 bottom
R30 "1.5K" RES_0402 16.18,20.295 r0 bottom
R31 "2K" RES_0402 11.709,22.733 r90 bottom
R32 "100K" RES_0402 20.159,17.302 r90 top
R33 "100K" RES_0402 19.013,17.341 r90 top
R34 "100K" RES_0402 17.955,17.335 r90 top
R35 "100K" RES_0402 8.708,16.183 r0 top
R36 "100K" RES_0402 8.717,17.279 r0 top
R37 "1K5" RES_0402 4.978,1.881 r90 top
R38 "1K5" RES_0402 3.53,1.896 r90 top
R39 "2K" RES_0402 22.8,25.7 r0 bottom
R40 "1K5" RES_0402 1.86,1.881 r90 top
R41 "R0402" RES_0402 4.727,9.105 r270 top
R42 "R0402" RES_0402 3.745,9.107 r90 top
TP1 "TP_NOBOM" PAD_RND_1MM#1 3.05,6.713 r90 top
TP2 "TP_NOBOM" PAD_RND_1MM#2 18.626,8.301 r90 bottom
U2 "LP5907-3.3" SOT-23-5 2.283,4.366 r0 bottom
U3 "LP5907-3.3" SOT-23-5 2.413,20.777 r0 bottom
U4 "LP5907-3.3" SOT-23-5 2.337,20.142 r0 top
U5 "STM32H753IIK6" FP-UFBGA176+25-A0E7-MFG 12.373,12.677 r90 bottom locked
U6 "SE050C2HQ1/Z01SDZ" FP-SOT1969-1-MFG 15.341,23.064 r180 bottom
U7 "FM25V02A-G" SOT127P602X155-8N 11.659,0.559 r180 bottom
U8 "LP5907-3.3" SOT-23-5 31.648,17.501 r90 top
U9 "MPM3811" QFN2x2x1p6_MPM3811_MNP 31.647,6.898 r270 top
U11 "MPM3811" QFN2x2x1p6_MPM3811_MNP 21.802,-0.144 r180 bottom
U13 "ICP-20100" FP-ICP-20100-MFG 22.293,23.673 r180 top
U14 "BMI330" "14-LGA (2.5x3)" 21.718,23.548 r90 bottom
X1 "16MHz 15pF" XTAL_3225 11.476,4.427 r180 bottom
Y1 "32.768Khz 12.5pF" FP-NX3215SA-MFG 15.462,4.898 r0 bottom

## Footprints (in the part's own frame and the unit in brackets; to place one, negate y for a bottom-side part, rotate by r counter-clockwise, add the part's x,y. Pads: shape width x height; smd on the part's side, far side on the other; paste and mask are expansions set on the pad)
"14-LGA (2.5x3)" [mm] "IMU"
  rect 0.475x0.25 smd: 1(-1.163,0.75) 2(-1.162,0.25) 3(-1.162,-0.25) 4(-1.162,-0.75) 8(1.162,-0.75) 9(1.162,-0.25) 10(1.162,0.25) 11(1.162,0.75)
  rect 0.25x0.475 smd: 5(-0.5,-0.913) 6(0,-0.912) 7(0.5,-0.913) 12(0.5,0.913) 13(0,0.913) 14(-0.5,0.913)
  silkscreen extent -1.3,1.1 -1,1.2, body extent -1.5,-1.19 1.5,1.19, height 0.87
BM20B(0.8)-34DS-0.4V [mm]
  rect 0.23x0.42 smd: 1(-3.2,-1.09) 2(-3.2,1.09) 3(-2.8,-1.09) 4(-2.8,1.09) 5(-2.4,-1.09) 6(-2.4,1.09) 7(-2,-1.09) 8(-2,1.09) 9(-1.6,-1.09) 10(-1.6,1.09) 11(-1.2,-1.09) 12(-1.2,1.09) 13(-0.8,-1.09) 14(-0.8,1.09) 15(-0.4,-1.09) 16(-0.4,1.09) 17(0,-1.09) 18(0,1.09) 19(0.4,-1.09) 20(0.4,1.09) 21(0.8,-1.09) 22(0.8,1.09) 23(1.2,-1.09) 24(1.2,1.09) 25(1.6,-1.09) 26(1.6,1.09) 27(2,-1.09) 28(2,1.09) 29(2.4,-1.09) 30(2.4,1.09) 31(2.8,-1.09) 32(2.8,1.09) 33(3.2,-1.09) 34(3.2,1.09)
  rect 0.3x0.75 smd: M1(-4.41,-0.925) M2(-4.41,0.925) M3(4.41,-0.925) M4(4.41,0.925)
  body extent -4.64,-1.12 4.64,1.18, height 0.79
CAP_0402 [mm]
  rrect25% 0.6x0.7 smd: 1(-0.5,0) 2(0.5,0)
  body extent -0.5,-0.26 0.5,0.27, height 0.37
CAP_0603 [mm]
  rrect25% 0.8x1 smd: 1(-0.75,0) 2(0.75,0)
  body extent -0.8,-0.4 0.8,0.4, height 0.51
CAP_0805 [mm]
  rrect25% 1.4x1.7 smd: 1(-1.143,0) 2(1.143,0)
  body extent -1.15,-0.76 1.15,0.79, height 1.01
FB_0402 [mm]
  rrect25% 0.6x0.7 smd: 1(-0.5,0) 2(0.5,0)
  body extent -0.5,-0.25 0.5,0.25, height 0.51
FP-ICP-20100-MFG [mm]
  rect 0.325x0.25 smd paste+0 mask+0: 1(-0.787,0.25) 2(-0.787,-0.25) 6(0.788,-0.25) 7(0.788,0.25)
  rect 0.25x0.325 smd paste+0 mask+0: 3(-0.5,-0.788) 4(0,-0.788) 5(0.5,-0.788) 8(0.5,0.787) 9(0,0.787) 10(-0.5,0.787)
  silkscreen extent -1.75,-1.03 1.03,1.03, body extent -1,-1 1,1, height 0.85
FP-NFM18-0_1-e0_15_0_35-MFG [mm]
  rect 0.6x0.6 smd paste+0 mask+0: 1(-0.8,0) 3(0.8,0)
  rect 0.4x0.4 smd paste+0 mask+0: 2(0,-0.4) 2(0,0.4)
  silkscreen extent -1.77,-0.92 0.85,0.92, body extent -0.8,-0.4 0.8,0.4, height 0.7
FP-NX3215SA-MFG [mm]
  rect 1x1.8 smd: 1(-1.25,0) 2(1.25,0)
  silkscreen extent -0.37,-0.8 0.37,0.8, body extent -1.6,-0.75 1.6,0.75, height 0.9
FP-SOD523-MFG [mm]
  rect 0.6x0.7 smd paste+0 mask+0: 1(-0.7,0) 2(0.7,0)
  silkscreen extent -1.7,-0.75 0.62,0.75, body extent -1.1,-0.53 1.1,0.53, height 0.25
FP-SOT23-MFG [mm]
  rect 0.8x0.8 smd paste+0 mask+0: 1(-1.2,0.95) 2(-1.2,-0.95) 3(1.2,0)
  silkscreen extent -0.9,-1.55 0.9,1.55, body extent -1.41,-1.45 1.41,1.45, height 1.25
FP-SOT1969-1-MFG [mm]
  rect 0.725x0.2 smd paste+0 mask-1000: 1(-1.538,0.8) 2(-1.538,0.4) 3(-1.538,0) 4(-1.538,-0.4) 5(-1.538,-0.8) 11(1.538,-0.8) 12(1.538,-0.4) 13(1.538,0) 14(1.538,0.4) 15(1.538,0.8)
  rect 0.2x0.725 smd paste+0 mask-1000: 6(-0.8,-1.538) 7(-0.4,-1.538) 8(0,-1.538) 9(0.4,-1.538) 10(0.8,-1.538) 16(0.8,1.538) 17(0.4,1.538) 18(0,1.538) 19(-0.4,1.538) 20(-0.8,1.538)
  rect 1.9x1.9 smd paste-1000 mask-1000: 21(0,0)
  silkscreen extent -2.7,-1.55 1.55,1.55, body extent -1.5,-1.5 1.5,1.5, height 0.33
FP-UFBGA176+25-A0E7-MFG [mm]
  round 0.3 smd paste+0 mask+0: A1(-4.55,4.55) A2(-3.9,4.55) A3(-3.25,4.55) A4(-2.6,4.55) A5(-1.95,4.55) A6(-1.3,4.55) A7(-0.65,4.55) A8(0,4.55) A9(0.65,4.55) A10(1.3,4.55) A11(1.95,4.55) A12(2.6,4.55) A13(3.25,4.55) A14(3.9,4.55) A15(4.55,4.55) B1(-4.55,3.9) B2(-3.9,3.9) B3(-3.25,3.9) B4(-2.6,3.9) B5(-1.95,3.9) B6(-1.3,3.9) B7(-0.65,3.9) B8(0,3.9) B9(0.65,3.9) B10(1.3,3.9) B11(1.95,3.9) B12(2.6,3.9) B13(3.25,3.9) B14(3.9,3.9) B15(4.55,3.9) C1(-4.55,3.25) C2(-3.9,3.25) C3(-3.25,3.25) C4(-2.6,3.25) C5(-1.95,3.25) C6(-1.3,3.25) C7(-0.65,3.25) C8(0,3.25) C9(0.65,3.25) C10(1.3,3.25) C11(1.95,3.25) C12(2.6,3.25) C13(3.25,3.25) C14(3.9,3.25) C15(4.55,3.25) D1(-4.55,2.6) D2(-3.9,2.6) D3(-3.25,2.6) D4(-2.6,2.6) D5(-1.95,2.6) D6(-1.3,2.6) D7(-0.65,2.6) D8(0,2.6) D9(0.65,2.6) D10(1.3,2.6) D11(1.95,2.6) D12(2.6,2.6) D13(3.25,2.6) D14(3.9,2.6) D15(4.55,2.6) E1(-4.55,1.95) E2(-3.9,1.95) E3(-3.25,1.95) E4(-2.6,1.95) E12(2.6,1.95) E13(3.25,1.95) E14(3.9,1.95) E15(4.55,1.95) F1(-4.55,1.3) F2(-3.9,1.3) F3(-3.25,1.3) F4(-2.6,1.3) F6(-1.3,1.3) F7(-0.65,1.3) F8(0,1.3) F9(0.65,1.3) F10(1.3,1.3) F12(2.6,1.3) F13(3.25,1.3) F14(3.9,1.3) F15(4.55,1.3) G1(-4.55,0.65) G2(-3.9,0.65) G3(-3.25,0.65) G4(-2.6,0.65) G6(-1.3,0.65) G7(-0.65,0.65) G8(0,0.65) G9(0.65,0.65) G10(1.3,0.65) G12(2.6,0.65) G13(3.25,0.65) G14(3.9,0.65) G15(4.55,0.65) H1(-4.55,0) H2(-3.9,0) H3(-3.25,0) H4(-2.6,0) H6(-1.3,0) H7(-0.65,0) H8(0,0) H9(0.65,0) H10(1.3,0) H12(2.6,0) H13(3.25,0) H14(3.9,0) H15(4.55,0) J1(-4.55,-0.65) J2(-3.9,-0.65) J3(-3.25,-0.65) J4(-2.6,-0.65) J6(-1.3,-0.65) J7(-0.65,-0.65) J8(0,-0.65) J9(0.65,-0.65) J10(1.3,-0.65) J12(2.6,-0.65) J13(3.25,-0.65) J14(3.9,-0.65) J15(4.55,-0.65) K1(-4.55,-1.3) K2(-3.9,-1.3) K3(-3.25,-1.3) K4(-2.6,-1.3) K6(-1.3,-1.3) K7(-0.65,-1.3) K8(0,-1.3) K9(0.65,-1.3) K10(1.3,-1.3) K12(2.6,-1.3) K13(3.25,-1.3) K14(3.9,-1.3) K15(4.55,-1.3) L1(-4.55,-1.95) L2(-3.9,-1.95) L3(-3.25,-1.95) L4(-2.6,-1.95) L12(2.6,-1.95) L13(3.25,-1.95) L14(3.9,-1.95) L15(4.55,-1.95) M1(-4.55,-2.6) M2(-3.9,-2.6) M3(-3.25,-2.6) M4(-2.6,-2.6) M5(-1.95,-2.6) M6(-1.3,-2.6) M7(-0.65,-2.6) M8(0,-2.6) M9(0.65,-2.6) M10(1.3,-2.6) M11(1.95,-2.6) M12(2.6,-2.6) M13(3.25,-2.6) M14(3.9,-2.6) M15(4.55,-2.6) N1(-4.55,-3.25) N3(-3.25,-3.25) N4(-2.6,-3.25) N5(-1.95,-3.25) N6(-1.3,-3.25) N7(-0.65,-3.25) N8(0,-3.25) N9(0.65,-3.25) N10(1.3,-3.25) N11(1.95,-3.25) N12(2.6,-3.25) N13(3.25,-3.25) N14(3.9,-3.25) N15(4.55,-3.25) P1(-4.55,-3.9) P2(-3.9,-3.9) P3(-3.25,-3.9) P4(-2.6,-3.9) P5(-1.95,-3.9) P6(-1.3,-3.9) P7(-0.65,-3.9) P8(0,-3.9) P9(0.65,-3.9) P10(1.3,-3.9) P11(1.95,-3.9) P12(2.6,-3.9) P13(3.25,-3.9) P14(3.9,-3.9) P15(4.55,-3.9) R1(-4.55,-4.55) R2(-3.9,-4.55) R3(-3.25,-4.55) R4(-2.6,-4.55) R5(-1.95,-4.55) R6(-1.3,-4.55) R7(-0.65,-4.55) R8(0,-4.55) R9(0.65,-4.55) R10(1.3,-4.55) R11(1.95,-4.55) R12(2.6,-4.55) R13(3.25,-4.55) R14(3.9,-4.55) R15(4.55,-4.55)
  round 0.3 smd paste+0: N2(-3.9,-3.25)
  silkscreen extent -6.07,-5.07 5.08,5.08, body extent -5.08,-5.08 5.08,5.08, height 0.61
HIROSE_DF40C-50DP-0-4V51 [mm] "Connector, Vertical Board to Board Receptacle; 50 pin, 11.52 mm L X 1.85 mm W X 1.29 mm H body"
  rrect50% 0.23x0.66 smd paste-0.018: 1(-4.8,1.355) 2(-4.8,-1.355) 3(-4.4,1.355) 4(-4.4,-1.355) 5(-4,1.355) 6(-4,-1.355) 7(-3.6,1.355) 8(-3.6,-1.355) 9(-3.2,1.355) 10(-3.2,-1.355) 11(-2.8,1.355) 12(-2.8,-1.355) 13(-2.4,1.355) 14(-2.4,-1.355) 15(-2,1.355) 16(-2,-1.355) 17(-1.6,1.355) 18(-1.6,-1.355) 19(-1.2,1.355) 20(-1.2,-1.355) 21(-0.8,1.355) 22(-0.8,-1.355) 23(-0.4,1.355) 24(-0.4,-1.355) 25(0,1.355) 26(0,-1.355) 27(0.4,1.355) 28(0.4,-1.355) 29(0.8,1.355) 30(0.8,-1.355) 31(1.2,1.355) 32(1.2,-1.355) 33(1.6,1.355) 34(1.6,-1.355) 35(2,1.355) 36(2,-1.355) 37(2.4,1.355) 38(2.4,-1.355) 39(2.8,1.355) 40(2.8,-1.355) 41(3.2,1.355) 42(3.2,-1.355) 43(3.6,1.355) 44(3.6,-1.355) 45(4,1.355) 46(4,-1.355) 47(4.4,1.355) 48(4.4,-1.355) 49(4.8,1.355) 50(4.8,-1.355)
  rrect50% 0.35x0.66 smd paste-0.024: M1(-5.275,1.355) M2(-5.275,-1.355) M3(5.275,1.355) M4(5.275,-1.355)
  silkscreen extent -5.76,-0.93 5.76,2.65, body extent -5.75,-1.49 5.77,1.48, height 1.13
HIROSE_DF40C-100DP-0_4V51 [mm] "Connector, Vertical Board to Board Plug; 104 pin, 21.52 mm L X 1.85 mm W X 1.29 mm H body"
  rect 0.23x0.66 smd: 1(-9.8,1.355) 2(-9.8,-1.355) 3(-9.4,1.355) 4(-9.4,-1.355) 5(-9,1.355) 6(-9,-1.355) 7(-8.6,1.355) 8(-8.6,-1.355) 9(-8.2,1.355) 10(-8.2,-1.355) 11(-7.8,1.355) 12(-7.8,-1.355) 13(-7.4,1.355) 14(-7.4,-1.355) 15(-7,1.355) 16(-7,-1.355) 17(-6.6,1.355) 18(-6.6,-1.355) 19(-6.2,1.355) 20(-6.2,-1.355) 21(-5.8,1.355) 22(-5.8,-1.355) 23(-5.4,1.355) 24(-5.4,-1.355) 25(-5,1.355) 26(-5,-1.355) 27(-4.6,1.355) 28(-4.6,-1.355) 29(-4.2,1.355) 30(-4.2,-1.355) 31(-3.8,1.355) 32(-3.8,-1.355) 33(-3.4,1.355) 34(-3.4,-1.355) 35(-3,1.355) 36(-3,-1.355) 37(-2.6,1.355) 38(-2.6,-1.355) 39(-2.2,1.355) 40(-2.2,-1.355) 41(-1.8,1.355) 42(-1.8,-1.355) 43(-1.4,1.355) 44(-1.4,-1.355) 45(-1,1.355) 46(-1,-1.355) 47(-0.6,1.355) 48(-0.6,-1.355) 49(-0.2,1.355) 50(-0.2,-1.355) 51(0.2,1.355) 52(0.2,-1.355) 53(0.6,1.355) 54(0.6,-1.355) 55(1,1.355) 56(1,-1.355) 57(1.4,1.355) 58(1.4,-1.355) 59(1.8,1.355) 60(1.8,-1.355) 61(2.2,1.355) 62(2.2,-1.355) 63(2.6,1.355) 64(2.6,-1.355) 65(3,1.355) 66(3,-1.355) 67(3.4,1.355) 68(3.4,-1.355) 69(3.8,1.355) 70(3.8,-1.355) 71(4.2,1.355) 72(4.2,-1.355) 73(4.6,1.355) 74(4.6,-1.355) 75(5,1.355) 76(5,-1.355) 77(5.4,1.355) 78(5.4,-1.355) 79(5.8,1.355) 80(5.8,-1.355) 81(6.2,1.355) 82(6.2,-1.355) 83(6.6,1.355) 84(6.6,-1.355) 85(7,1.355) 86(7,-1.355) 87(7.4,1.355) 88(7.4,-1.355) 89(7.8,1.355) 90(7.8,-1.355) 91(8.2,1.355) 92(8.2,-1.355) 93(8.6,1.355) 94(8.6,-1.355) 95(9,1.355) 96(9,-1.355) 97(9.4,1.355) 98(9.4,-1.355) 99(9.8,1.355) 100(9.8,-1.355)
  rect 0.35x0.66 smd: M1(-10.275,1.355) M2(-10.275,-1.355) M3(10.275,1.355) M4(10.275,-1.355)
  silkscreen extent -10.76,-0.93 10.76,2.28, body extent -10.76,-1.48 10.76,1.49, height 1.13
LED_0603_BLUE [mm]
  rrect25% 0.8x1 smd: A(0.75,0) K(-0.75,0)
  silkscreen extent -1.5,-0.8 -0.8,0.8, body extent -0.8,-0.4 0.8,0.4, height 0.6
LED_0603_GREEN [mm]
  rrect25% 0.8x1 smd: A(0.75,0) K(-0.75,0)
  silkscreen extent -1.5,-0.8 -0.8,0.8, body extent -0.8,-0.4 0.8,0.4, height 0.6
LED_0603_RED [mm]
  rrect25% 0.8x1 smd: A(0.75,0) K(-0.75,0)
  silkscreen extent -1.5,-0.8 -0.8,0.8, body extent -0.8,-0.4 0.8,0.4, height 0.6
PAD_RND_1MM#1 [mm]
  round 1 smd paste-0.5 mask+0: 1(-0.207,0.058)
PAD_RND_1MM#2 [mm]
  round 1 smd paste-0.5 mask+0: 1(0,0)
QFN2x2x1p6_MPM3811_MNP [mm]
  round 0.025 smd: 1(-0.9,0.75)
  rect 0.7x0.25 smd: 2(-0.95,0.25) 3(-0.95,-0.25) 4(-0.95,-0.75) 6(0.95,-0.75) 7(0.95,-0.25) 8(0.95,0.25) 9(0.95,0.75)
  rect 0.25x1.1 smd: 5(0,-0.75)
  rect 0.25x0.7 smd: 10(0,0.95)
  Top Layer region: 0.599,-0.875 0.849,-0.875 0.849,0.375 0.599,0.375
  Top Layer region: -0.826,-0.875 -0.576,-0.875 -0.576,0.375 -0.826,0.375
  Top Layer region: -1.3,0.875 -0.625,0.875 -0.5,0.75 -0.5,0.625 -1.3,0.625
  body extent -1,-1 1,1, height 1.6
RES_0402 [mm]
  rrect25% 0.6x0.7 smd: 1(-0.5,0) 2(0.5,0)
  body extent -0.5,-0.25 0.5,0.25, height 0.3
RES_0603 [mm]
  rrect25% 0.8x1 smd: 1(-0.75,0) 2(0.75,0)
  body extent -0.8,-0.43 0.8,0.43, height 0.52
SEIK-MS621FE-FL11E-2_V [mm] "SMD, 2-Leads, Diameter 6.8mm"
  rect 1.8x0.5 smd: 1(4.75,0.75)
  rect 1.7x0.5 smd: 2(4.8,-0.75)
  silkscreen extent -3.4,-3.4 5,3.4, body extent -3.4,-3.4 4.35,3.4, height 2.7
SOT127P602X155-8N [mm]
  rect 1.45x0.6 smd: 1(-2.75,1.905) 2(-2.75,0.635) 3(-2.75,-0.635) 4(-2.75,-1.905) 5(2.75,-1.905) 6(2.75,-0.635) 7(2.75,0.635) 8(2.75,1.905)
  silkscreen extent -3.47,-2.44 1.68,2.55, body extent -3.01,-2.44 3.01,2.44, height 1.55
SOT-23-5 [mm] "SOT23, 5-Leads, Body 2,90x2,80mm, Pitch 0,95mm, IPC Medium Density"
  rrect25% 1.05x0.6 smd: 1(-1.325,0.95) 2(-1.325,0) 3(-1.325,-0.95) 4(1.325,-0.95) 5(1.325,0.95)
  silkscreen extent -1.45,-1.45 0.4,1.92, body extent -1.4,-1.45 1.4,1.45, height 1.45
TF15X15 [mm]
  rect 0.7x1.4 smd: 1(2.475,6.95) 2(1.375,6.95) 3(0.275,6.95) 4(-0.825,6.95) 5(-1.925,6.95) 6(-3.025,6.95) 7(-4.125,6.95) 8(-5.225,6.95) 9(-6.325,6.95)
  round 0.45 hole 0.9 unplated: 14(-4.725,-3.65) 15(3.275,-3.65)
  rect 1.6x1.4 smd: MP1(-7.775,6.35) MP2(7.075,6.35)
  rect 1.2x2.2 smd: MP3(-7.525,-3.25) MP4(7.975,-3.25)
  silkscreen extent -7.15,-7.65 7.6,8.25, body extent -7.82,-7.65 8.27,7.35, height 1.92
XTAL_3225 [mm]
  rrect10% 1.3x1.1 smd: 1(-1.15,-0.95) 2(1.15,-0.95) 3(1.15,0.95) 4(-1.15,0.95)
  silkscreen extent -2.23,-1.89 -1,-1, body extent -1.6,-1.28 1.6,1.22, height 0.61

## Part data
BT1: library part CMP-2000-05342-1, "MS Lihium Rechargeable Battery, 3 V, -20 to 60 degC, Tray", Capacity=5.5mAh, Manufacturer=SeikoInstruments, Output Voltage=3V, Battery Size=621, Brand=SeikoInstrumentsMicroEnergy, Chemistry=Lithium, Datasheet URL=http://datasheet.octopart.com/MS621FE-FL11E-Seiko-datasheet-5320152.pdf, Datasheet Version=Jan-08, Diameter=6.8mm, Factory Pack Quantity=100, Height=2.1mm, Manufacturer URL=http://www.sii.co.jp/en/, Mounting Style=WithLeads, Orientation=Vertical, Packaging=Tray, Product Category=CoinCellBattery, Rechargeable/Non-Rechargeable=Rechargeable, RoHS=NotApplicable, Series=MS, Termination Style=ThroughHole, Type=CoinCellBatterywithLeads, Unit Weight=0.008113oz
C1 C14: library part CMP-06053-000054-1, "Large Current 3 Terminals Low ESL Chip Multilayer Ceramic Capacitors for General Purpose, 0603, 0.10uF, 20%, 16V", Capacitance=100nF, Case Code (Imperial)=0603, Case Code (Metric)=1608, Current=2A, DC Resistance (DCR)=30mR, Insulation Resistance=1GR, Max Operating Temperature=125°C, Max Voltage Rating (DC)=16V, Min Operating Temperature=-55°C, Package Quantity=4000, Tolerance=20%, Case/Package=0603, Current Rating=2A, Depth=0.8mm, Height=0.6mm, Lead Free="Lead Free", Length=1.6mm, Max Current Rating=2A, Mount=PCB, Packaging="Tape and Reel", Radiation Hardening=No, REACH SVHC="No SVHC", Termination=Flat, Voltage=16V, Voltage Rating=16V, Voltage Rating (DC)=16V, Width=0.8mm
C2 C5 C6 C7 C11 C12 C13 C15 C18 C22 C26 C27 C29 C31 C33 C35: library part CAP_0603, "Capacitor SMD 0603"
C16 C17 C19 C20 C23 C24 C25 C28 C30 C36 C37 C38 C39 C40 C41 C42 C43 C44 C45 C46 C47 C48 C49 C50 C51 C52 C53: library part CAP_0402, "Capacitor SMD 0402"
C21: library part CAP_0805, "Capacitor SMD 0805"
D1: library part CMP-12790-000053-1, "DIODE SCHOTTKY SOD523", Forward Current=200mA, Manufacturer="Diodes Inc.", Manufacturer Part Number=SDM20U30-7, Max Junction Temp=+125°C, Max Repetitive Reverse Voltage=30V, Max Surge Forward Current=1A, Package=SOD523, Peak Reverse Current=150uA, Temperature="-65°C to +125°C", Temperature Range Low=-65°C, Automotive=Yes, Automotive Grade="Grade 1", Category=Diode, ComponentLink2Description=Datasheet, ComponentLink2URL=https://www.diodes.com/assets/Datasheets/ds30397.pdf, Device Class L1="Discrete Semiconductors", Device Class L2=Diodes, Device Class L3="Schottky Diodes", Digikey Description="DIODE SCHOTTKY 30V 200MA SOD523", Footprint Url=https://www.diodes.com/assets/Package-Files/SOD523.pdf, Height=0.65mm, Lead Free=Yes, Mouser Description="SDM20U30 Series 20 V 200 mA Surface Mount Schottky Barrier Diode - SOD-523", Octopart=https://octopart.com/sdm20u30-7-diodes+inc.-333874, Reverse Voltage=30V, RoHS=TRUE, Temperature Range High=+125°C
D2: library part LED_0603_RED, "LED 0603 RED SMD"
D3: library part LED_0603_GREEN, "LED 0603 GREEN SMD"
D4: library part LED_0603_BLUE, "LED 0603 BLUE SMD"
FB1 FB2 FB3: library part FB_0402, "Ferrite Bead SMD 0402"
J1: "-25℃~+85℃ 2mm Connector and Ejector MicroSD Card (TF Card) Push-Push SMD SD Card / Memory Card Connector ROHS"
J2: library part "IMU PCB connector", "34 Position Connector Header, Outer Shroud Contacts Surface Mount Gold"
J3: library part CONN_HDR_2X50_PLUG_0.4MM_SMD, Manufacturer="Hirose Electric Co Ltd", Manufacturer Part Number=DF40C-100DP-0.4V(51), Operating Temperature="-65°C ~ 85°C", Supplier Part Number 1=H11614CT-ND, Category="Connectors, Interconnects", ComponentLink1Description=https://www.digikey.com/product-detail/en/hirose-electric-co-ltd/DF40C-100DP-0.4V-51/H11614CT-ND/1969494, ComponentLink1URL=https://www.digikey.com/product-detail/en/hirose-electric-co-ltd/DF40C-100DP-0.4V-51/H11614CT-ND/1969494, Mounting Type="Surface Mount", Number of Positions=100, Number of Rows=2, Packaging="Cut Tape (CT)", Part Status=Active, Pitch="0.016\" (0.40mm)", Pricing 1="1=1.96 (USD)", Stock 1=27593, Supplier 1=Digi-Key, System=Connector
J4: library part CONN_HDR_2X25_PLUG_0.4MM_SMD, Manufacturer="Hirose Electric Co Ltd", Manufacturer Part Number=DF40C-50DP-0.4V(51), Operating Temperature="-65°C ~ 85°C", Supplier Part Number 1=H11626CT-ND, Category="Connectors, Interconnects", ComponentLink1Description=https://www.digikey.com/products/en/connectors-interconnects/rectangular-connectors-arrays-edge-type-mezzanine-board-to-board/308?k=DF40C-50DP-0.4V51&k=&pkeyword=DF40C-50DP-0.4V51&pv7=2&sf=0&quantity=&ColumnSort=0&page=1&pageSize=25, ComponentLink1URL=https://www.digikey.com/products/en/connectors-interconnects/rectangular-connectors-arrays-edge-type-mezzanine-board-to-board/308?k=DF40C-50DP-0.4V51&k=&pkeyword=DF40C-50DP-0.4V51&pv7=2&sf=0&quantity=&ColumnSort=0&page=1&pageSize=25, Mounting Type="Surface Mount", Number of Positions=50, Number of Rows=2, Packaging="Cut Tape (CT)", Part Status=Active, Pitch="0.016\" (0.40mm)", Pricing 1="1=1.12, 10=0.982, 25=0.924, 50=0.8856, 100=0.847, 250=0.77, 500=0.693, 1000=0.616 (USD)", Stock 1=57993, Supplier 1=Digi-Key, System=Connector
Q1 Q2: library part CMP-83955-000006-1, "MOSFET N-CH 30V 5.7A SOT23", Case/Package=SOT-23, Continuous Drain Current (ID)=5.7A, Drain to Source Voltage (Vdss)=30V, Gate to Source Voltage (Vgs)=12V, Input Capacitance=630pF, Max Operating Temperature=150°C, Max Power Dissipation=1.4W, Min Operating Temperature=-55°C, Lead Free="Lead Free", Mount="Surface Mount", Number of Elements=1, Number of Pins=3, Packaging="Tape and Reel", Power Dissipation=1.4W, Radiation Hardening=No, Rds On Max=26.5mR
R1 R2 R3 R4 R5 R6 R7 R8 R9 R10 R11 R12 R13 R14 R15 R16 R17 R18 R19 R21 R22 R23 R24 R25 R26 R27 R28 R29 R30 R31 R32 R33 R34 R35 R36 R37 R38 R39 R40 R41 R42: library part RES_0402, "Resistor SMD 0402"
R20: library part RES_0603, "Resistor SMD 0603"
TP1 TP2: library part TEST_POINT_RND_1MM, "Test Point Round 1mm (NO BOM)"
U2 U3 U4 U8: "82dB@(1kHz) 250mA Fixed 3.3V Positive 5.5V SOT-23-5 Voltage Regulators - Linear, Low Drop Out (LDO) Regulators ROHS"
U5: library part CMP-12105-000018-1, "UFBGA 10X10X0.6 176+", Ambient Temperature Range High=+85°C, Ambient Temperature Range Low=-40°C, Frequency=400MHz, Manufacturer=STMicroelectronics, Max Junction Temp=+125°C, Max Supply Voltage=3.6V, Min Supply Voltage=1.62V, Package=UFBGA176+25-A0E7, Temperature="-40°C to +125°C", Automotive=No, Category=IC, ComponentLink2Description=Datasheet, ComponentLink2URL=https://www.st.com/resource/en/datasheet/stm32h753ii.pdf, Core Architecture="ARM Cortex-M7", Data Bus Width=32bits, Device Class L1="Integrated Circuits (ICs)", Device Class L2="Embedded Processors and Controllers", Device Class L3=Microcontrollers, Digikey Description="UFBGA 10X10X0.6 176+", Height=0.6mm, Interface=I2C,SPI,UART,USART,CAN,USB,LIN,IrDA,Ethernet,I2S,Other, Ipc Land Pattern Name=BGA225N65P15X15_1000X1000X60, Lead Free=Yes, Manufacturer Part Number=STM32H753IIK6, Memory Size=2MBytes, Memory Type=FLASH, Mouser Description="MCU 32-Bit STM32 ARM Cortex M7 RISC 2MB Flash 1.8V/2.5V/3.3V 176-Pin UFBGA Tray", Number Of A/D Converters=3, Number Of Adc Channels=36, Number Of Cores=1, Number Of Ethernet Channels=1, Number Of I2C Channels=4, Number Of I/Os=140, Number Of Pwm Channels=42, Number Of Spi Channels=6, Number Of Timers/Counters=20, Number Of Uart Channels=9, Number Of Usb Channels=2, Octopart=https://octopart.com/stm32h753iik6-stmicroelectronics-84735750, Ram Size=1MBytes, RoHS=TRUE, Temperature Range High=+125°C, Temperature Range Low=-40°C
U6: library part CMP-10098-000036-1, "ECC RSA AES DES MIFARE KDF CL-IF"
U7: "NVRAM NVRAM FRAM Memory Serial", Manufacturer_Name=Infineon, Mouser Part Number=727-FM25V02A-G, Arrow Part Number=FM25V02A-G, Arrow Price/Stock=https://www.arrow.com/en/products/fm25v02a-g/infineon-technologies-ag?region=europe, Datasheet Link=https://componentsearchengine.com/Datasheets/1/FM25V02A-G.pdf, Geometry.Height=1.549mm, Manufacturer_Part_Number=FM25V02A-G, Mouser Price/Stock=https://www.mouser.co.uk/ProductDetail/Infineon-Technologies/FM25V02A-G?qs=IxCaM9nJKKU1F7p7SsPN2Q%3D%3D
U9 U11: "Non-Isolated PoL Module DC DC Converter 1 Output 0.6 ~ 3.3V 1A 2.3V - 5.5V Input"
U13: library part CMP-03292-111934633-1, "ICP-20100 Barometric Pressure and Temperature Sensor IC Digital Output 1.8V/3.3V 10-Pin LGA T/R", Min Operating Temperature=-40°C, Length=2mm, Max Length=2.08mm, Max Thickness=800µm, Max Width=2.08mm, Min Length=1.92mm, Min Thickness=640µm, Min Width=1.92mm, NexarPartId=111934633, Width=2mm
U14: "Bosch Sensortec Accelerometer, Gyroscope, Temperature, 3 Axis Sensor I²C, I3C℠, SPI Output"
X1: library part TSX-3225_24.0000MF15X-AC, "Crystal SMD 24MHz 10PPM 7pF 3225", Manufacturer=Epson, Manufacturer Part Number="TSX-3225 24.0000MF15X-AC"
Y1: library part CMP-00536-22488149-1, "NX3215SA-32.768K-STD-MUA-14 Parallel - Fundamental Quartz Crystal, 0.032768MHz Nom", Case/Package=SMD/SMT, ESR (Equivalent Series Resistance)=70kΩ, Frequency=32.768kHz, Frequency Tolerance=0.002%, Load Capacitance=6pF, Max Operating Temperature=85°C, Min Operating Temperature=-40°C, Height=889µm, Length=3.2004mm, Mount="Surface Mount", NexarPartId=22488149, Number of Pins=2, Packaging="Tape & Reel (TR)", RoHS=Compliant, Width=1.4986mm

## Free pads (board coordinates)
  round 3.4 hole 2: M1(31.4,0) M2(31.4,24.4) M3(0,0) M4(0,24.4)

## Via types
v1: diameter 0.3, hole 0.15, Top Layer to Bottom Layer, tented both sides, 279 vias
v2: diameter 0.3, hole 0.15, Signal1 to Signal2, tented both sides, 267 vias
v3: diameter 0.4, hole 0.2, Signal2 to Bottom Layer, tented both sides, 209 vias
v4: diameter 0.4, hole 0.2, Top Layer to Signal1, tented both sides, 54 vias
v5: diameter 0.3, hole 0.15, Top Layer to Bottom Layer, tented top, 2 vias

## Nets (pads, with @x,y where several pads share a name; then routed paths per layer and width w, separated by ;. In a path a pad name is that pad's centre, name@x,y a point inside that pad or via, vN(x,y) a via of type N, cw(c..) or ccw(c..) an arc to the next point about the centre after c; other vN are vias at no path point)
ADC1_3V3: J3.92 U5.M5 | length 28.7
  Signal1 w0.1: v2(9.605,20.751) 9.605,20.697 9.69,20.611 9.69,20.523 10.19,20.023 10.19,19 10.19,16.743 10.292,16.641 10.292,14.298 10.127,14.133 10.127,12.261 v2(10.154,12.233)
  Signal2 w0.1: v2(9.605,20.751) 9.605,20.797 9.896,21.088 10.752,21.088 10.955,20.886 11.438,20.886 11.726,20.598 12.269,20.598 12.665,20.993 14.98,20.993 15.698,21.711 15.961,21.711 16.026,21.776 18.027,21.776 18.297,21.506 19.444,21.506 19.792,21.853 23.575,21.853 23.942,21.487 v3(23.942,21.455) ; v2(10.154,12.233) 10.154,12.218 10.313,12.059 10.33,12.059 10.672,11.717 v3(10.746,11.717)
  Bottom Layer w0.1: U5.M5@9.773,10.727 9.821,10.727 10.599,11.505 10.599,11.508 10.746,11.655 v3(10.746,11.717) ; v3@23.944,21.455 24.354,21.045 24.354,20.671 24.625,20.399 J3.92@25.245,20.4
ADC1_6V6: J3.90 U5.M4 | length 28.9
  Signal1 w0.1: v2(10.09,20.688) 10.678,20.1 10.678,19 10.678,17.146 10.8,17.024 10.8,15.781 10.539,15.521 10.539,12.099 10.678,11.96 10.678,10.548 10.66,10.53 10.66,10.428 v2(10.622,10.39)
  Signal2 w0.1: v2(10.09,20.688) 10.129,20.727 10.183,20.727 10.244,20.788 10.628,20.788 10.83,20.586 11.314,20.586 11.602,20.298 12.394,20.298 12.789,20.693 15.118,20.693 15.836,21.411 16.086,21.411 16.151,21.476 17.902,21.476 18.404,20.974 19.815,20.974 19.965,20.825 23.288,20.825 23.4,20.937 23.619,20.937 v3(23.657,20.975) ; v3(10.104,9.745) 10.137,9.778 10.137,10.037 10.451,10.351 10.584,10.351 v2(10.622,10.39)
  Bottom Layer w0.1: U5.M4@9.773,10.077 v3(10.104,9.745) ; v3(23.657,20.975) 23.722,20.975 24.032,20.664 24.032,20.431 24.428,20.035 25.21,20.035 J3.90@25.245,20
BUZZER_1: J3.4 U5.L2 | length 33.9
  Signal1 w0.1: v2(7.602,6.9) 7.619,6.883 7.619,6.736 7.619,4.103 8.016,3.706 8.016,3.115 7.836,2.935 7.836,2.554 7.995,2.395 7.995,1.181 7.75,0.936 v2(7.75,0.025)
  Signal2 w0.1: v2@7.605,6.897 9.086,6.897 9.672,7.483 v3(9.707,7.483) ; v2(7.75,0.025) 7.804,0.025 7.882,-0.053 7.896,-0.053 8.079,-0.236 10.38,-0.236 10.906,0.289 12.671,0.289 12.872,0.088 13.619,0.088 13.877,0.347 13.948,0.347 13.997,0.395 21.901,0.395 21.99,0.306 22.292,0.306 22.303,0.317 23.455,0.317 23.465,0.306 23.477,0.306 23.977,-0.194 25.21,-0.194 25.848,0.444 25.859,0.444 25.961,0.545 v3(26.042,0.545)
  Bottom Layer w0.1: v3(9.707,7.483) 9.739,7.483 10.098,7.842 10.098,8.452 U5.L2@10.423,8.777 ; J3.4@25.245,2.8 25.28,2.765 26.025,2.765 26.383,2.407 26.383,0.897 26.042,0.556 v3(26.042,0.545)
CAN1_RX: J3.65 U5.B12 | length 12.5
  Signal2 w0.1: v3(21.553,15.989) 21.634,15.989 21.8,16.154 21.882,16.154 21.935,16.102 24.785,16.102 24.904,16.22 26.216,16.22 26.905,15.531 ; 26.906,15.531 27.013,15.425 v3(27.094,15.425)
  Bottom Layer w0.1: U5.B12@16.273,15.277 16.498,15.277 16.836,15.614 18.161,15.614 19.503,15.614 19.795,15.906 21.325,15.906 21.333,15.914 21.396,15.914 21.414,15.931 21.495,15.931 v3(21.553,15.989) ; v3(27.094,15.425) 27.103,15.425 27.305,15.223 27.932,15.223 J3.65@27.955,15.2
CAN1_TX: J3.63 U5.C12 | length 19.6
  Top Layer w0.1: v1(15.97,15.61) 16.38,15.61 16.898,16.127 16.898,18.538 17.36,19 17.76,19.4 v4@21.6,19.4
  Signal1 w0.1: v4(21.511,19.4) 21.511,18.179 21.889,17.801 v2(21.889,15.678)
  Signal2 w0.1: v2(21.889,15.678) 21.925,15.678 22.047,15.8 25.027,15.8 25.13,15.903 25.93,15.903 26.311,15.522 26.311,15.52 26.427,15.404 v3(26.427,15.348)
  Bottom Layer w0.1: U5.C12@15.623,15.277 15.639,15.277 v1(15.97,15.61) v1(15.97,15.61) ; v3(26.427,15.348) 26.493,15.348 27.041,14.8 J3.63@27.955,14.8
CAN2_RX: J3.59 U5.P12 | length 39.6
  Signal1 w0.1: v2(5.606,15.897) 5.579,15.924 5.579,16.432 6.082,16.936 6.082,17.598 5.982,17.699 5.982,20.505 5.982,20.588 v2(6.142,20.746) v2(6.142,20.746) ; v2@27.333,14.438 27.312,14.459 27.312,14.674 27.452,14.813 27.452,20.81 27.462,20.82 27.462,20.962 v2(27.5,21)
  Signal2 w0.1: v2(5.606,15.897) 5.644,15.859 5.644,15.766 5.671,15.739 5.671,15.72 5.737,15.654 6.246,15.654 6.627,15.273 7.82,15.273 v3(8.148,15.601) ; v2(6.142,20.746) 6.189,20.746 6.893,21.451 8.058,21.451 8.508,21.9 10.739,21.9 10.85,22.011 14.194,22.011 14.395,21.81 15.372,21.81 15.573,22.011 15.837,22.011 15.92,22.094 17.822,22.094 18.089,22.361 18.877,22.361 19.085,22.153 20.099,22.153 20.175,22.229 23.671,22.229 23.73,22.288 26.341,22.288 27.462,21.167 27.462,21.038 v2(27.5,21) ; v3(27.203,13.921) 27.26,13.978 27.26,14.108 27.282,14.13 27.282,14.328 27.333,14.378 v2(27.333,14.432)
  Bottom Layer w0.1: v3(8.148,15.601) U5.P12@8.473,15.277 ; v3(27.203,13.921) 27.254,13.972 27.927,13.972 J3.59@27.955,14
CAN2_TX: J3.57 U5.P13 | length 41.8
  Signal1 w0.1: v2(5.652,20.923) 5.682,20.893 5.682,17.504 5.771,17.414 5.771,17.213 v2(5.782,17.201) ; v2(27.17,13.409) 27.489,13.409 27.752,13.672 27.752,20.686 27.942,20.876 27.942,21.187 v2(27.955,21.2)
  Signal2 w0.1: v2(5.652,20.923) 5.616,20.958 5.616,21.112 5.411,21.318 5.411,21.651 5.76,22 8.183,22 8.383,22.2 10.615,22.2 10.726,22.311 14.318,22.311 14.512,22.118 15.256,22.118 15.506,22.368 15.769,22.368 15.796,22.394 17.693,22.394 17.96,22.661 19.001,22.661 19.21,22.453 19.975,22.453 20.05,22.529 23.547,22.529 23.606,22.588 26.48,22.588 27.799,21.269 27.832,21.269 27.901,21.2 v2(27.955,21.2) ; v2(5.782,17.201) 5.82,17.163 5.943,17.163 v3@6.307,16.799 ; v3(26.676,13.436) 26.702,13.41 27.169,13.41 v2(27.17,13.409)
  Bottom Layer w0.1: v3(6.31,16.802) 6.342,16.769 6.572,16.769 6.7,16.641 6.873,16.641 7.071,16.443 7.071,16.44 7.247,16.264 7.25,16.264 7.262,16.252 8.148,16.252 U5.P13@8.473,15.927 ; v3(26.676,13.436) 26.702,13.41 27.458,13.41 27.583,13.535 27.89,13.535 J3.57@27.955,13.6
ETH_CRS_DV: J4.7 U5.R3 | length 6.4
  Bottom Layer w0.089: J4.7@2.055,8.6 3.1,8.6 3.5,8.2 5.305,8.2 6,8.895 6.493,9.388 7.664,9.388 ; 7.665,9.388 7.784,9.388 U5.R3@7.823,9.427
ETH_MDC: J4.4 U5.M3 | length 13.3
  Top Layer w0.1: v1(0.817,7.8) 0.818,7.746 0.889,7.674 0.889,7.647 1.146,7.39 2.391,7.39 2.557,7.556 4.725,7.556 5.235,7.045 6,7.045 8.212,7.045 8.253,7.004 8.528,7.004 9.16,7.635 9.16,9.439 v1(9.474,9.754)
  Bottom Layer w0.1: J4.4@-0.655,7.8 v1(0.817,7.8) ; v1(9.474,9.754) 9.474,9.725 U5.M3@9.773,9.427
ETH_MDIO: J4.2 U5.P2 | length 11.3
  Bottom Layer w0.1: J4.2@-0.652,7.397 -0.605,7.35 0.275,7.35 1.571,6.054 5.7,6.054 6.184,6.539 6.184,6.736 6.184,7.32 6.604,7.74 7.336,8.472 8.168,8.472 U5.P2@8.473,8.777
ETH_POWER_EN: J4.6 U5.B7 | length 29.7
  Signal1 w0.1: v2(19.552,11.779) 19.554,11.779 19.713,11.621 19.713,8.306 19.564,8.157 v2(19.564,8.136)
  Signal2 w0.1: v3(0.7,8.25) 0.757,8.307 0.934,8.307 1.228,8.602 1.759,8.602 1.933,8.428 2.997,8.428 3.283,8.142 3.283,7.499 3.606,7.176 4.682,7.176 5.017,6.841 6,6.841 6.835,6.841 7.395,7.4 7.763,7.4 8.168,7.805 9.095,7.805 9.323,8.033 11.032,8.033 11.435,7.63 14.835,7.63 15.112,7.906 18.717,7.906 18.96,8.149 19.551,8.149 v2(19.564,8.136) ; v3(18.8,11.829) 18.858,11.772 18.991,11.772 19.009,11.754 19.526,11.754 v2(19.552,11.779)
  Bottom Layer w0.1: J4.6@-0.655,8.2 0.65,8.2 v3(0.7,8.25) ; U5.B7@16.273,12.027 16.596,11.703 18.593,11.703 18.71,11.82 v3@18.8,11.82
ETH_REF_CLK: J4.3 U5.N2 | length 8.2
  Top Layer w0.1: v1@2.89,7.97 4.744,7.97 5.349,7.365 6,7.365 8.004,7.365 8.806,8.167 v1(8.806,8.493)
  Bottom Layer w0.1: J4.3@2.055,7.8 2.703,7.8 2.88,7.976 v1(2.883,7.976) ; v1(8.806,8.493) 8.835,8.493 9.118,8.777 U5.N2@9.123,8.777
ETH_RXD0: J4.11 U5.N5 | length 7.6
  Bottom Layer w0.089: J4.11@2.055,9.395 3.795,9.395 4.779,10.379 6,10.379 8.776,10.379 U5.N5@9.123,10.727
ETH_RXD1: J4.15 U5.P5 | length 7
  Bottom Layer w0.089: J4.15@2.055,10.2 4,10.2 4.493,10.693 6,10.693 6.365,10.693 6.787,11.115 7.205,11.115 7.252,11.069 8.131,11.069 U5.P5@8.473,10.727
ETH_TX_EN: J4.27 U5.R13 | length 14.1
  Bottom Layer w0.089: J4.27@2.055,12.6 2.09,12.635 3.872,12.635 3.976,12.739 4.013,12.776 4.013,12.784 ccw(c3.819,12.784) 3.819,12.978 3.814,12.978 cw(c3.814,13.173) 3.619,13.173 cw(c3.814,13.173) 3.814,13.367 4.494,13.367 ccw(c4.494,13.562) 4.689,13.562 ccw(c4.494,13.562) 4.494,13.756 3.768,13.756 cw(c3.768,13.951) 3.574,13.951 cw(c3.768,13.951) 3.768,14.145 4.333,14.145 ccw(c4.333,14.34) 4.528,14.34 ccw(c4.333,14.34) 4.333,14.534 3.677,14.534 cw(c3.677,14.729) 3.482,14.729 cw(c3.677,14.729) 3.677,14.923 4.494,14.923 ccw(c4.494,15.118) 4.689,15.118 ccw(c4.494,15.118) 4.494,15.312 4.208,15.312 cw(c4.208,15.507) 4.013,15.507 4.013,15.697 4.222,15.906 4.243,15.927 6,15.927 U5.R13@7.823,15.927
ETH_TXD0: J4.19 U5.A8 | length 15.6
  Top Layer w0.089: v1(5.653,11.123) 5.707,11.123 5.817,11.232 6,11.232 9.073,11.232 9.808,11.967 16.304,11.967 16.601,12.264 v1(16.601,12.266)
  Bottom Layer w0.089: J4.19@2.055,11 2.09,11.035 2.465,11.035 2.554,11.123 v1(5.653,11.123) ; v1(16.601,12.266) 16.601,12.3 16.923,12.622 U5.A8@16.923,12.677
ETH_TXD1: J4.23 U5.B8 | length 14.9
  Top Layer w0.089: v1(5.74,11.627) 5.781,11.667 5.879,11.667 5.899,11.686 6,11.686 9.062,11.686 9.642,12.267 v1(15.953,12.267)
  Bottom Layer w0.089: J4.23@2.055,11.8 2.551,11.8 2.891,11.46 4.349,11.46 4.48,11.591 5.705,11.591 v1(5.74,11.627) ; v1(15.953,12.267) 15.994,12.308 15.994,12.397 U5.B8@16.273,12.677